# Altium PCB Flight Controller SoM.PcbDoc (part 1 of 3)
Units mm, origin at the board's own origin, x right, y up, seen from the top; angles counter-clockwise.
Board outline 55 x 40 mm, 8 copper layers (L1, L2, L3, L4, L5, L6, L7, L8), stack 1.028 mm thick; 176 components, 217 nets, 863 pads, 595 vias.
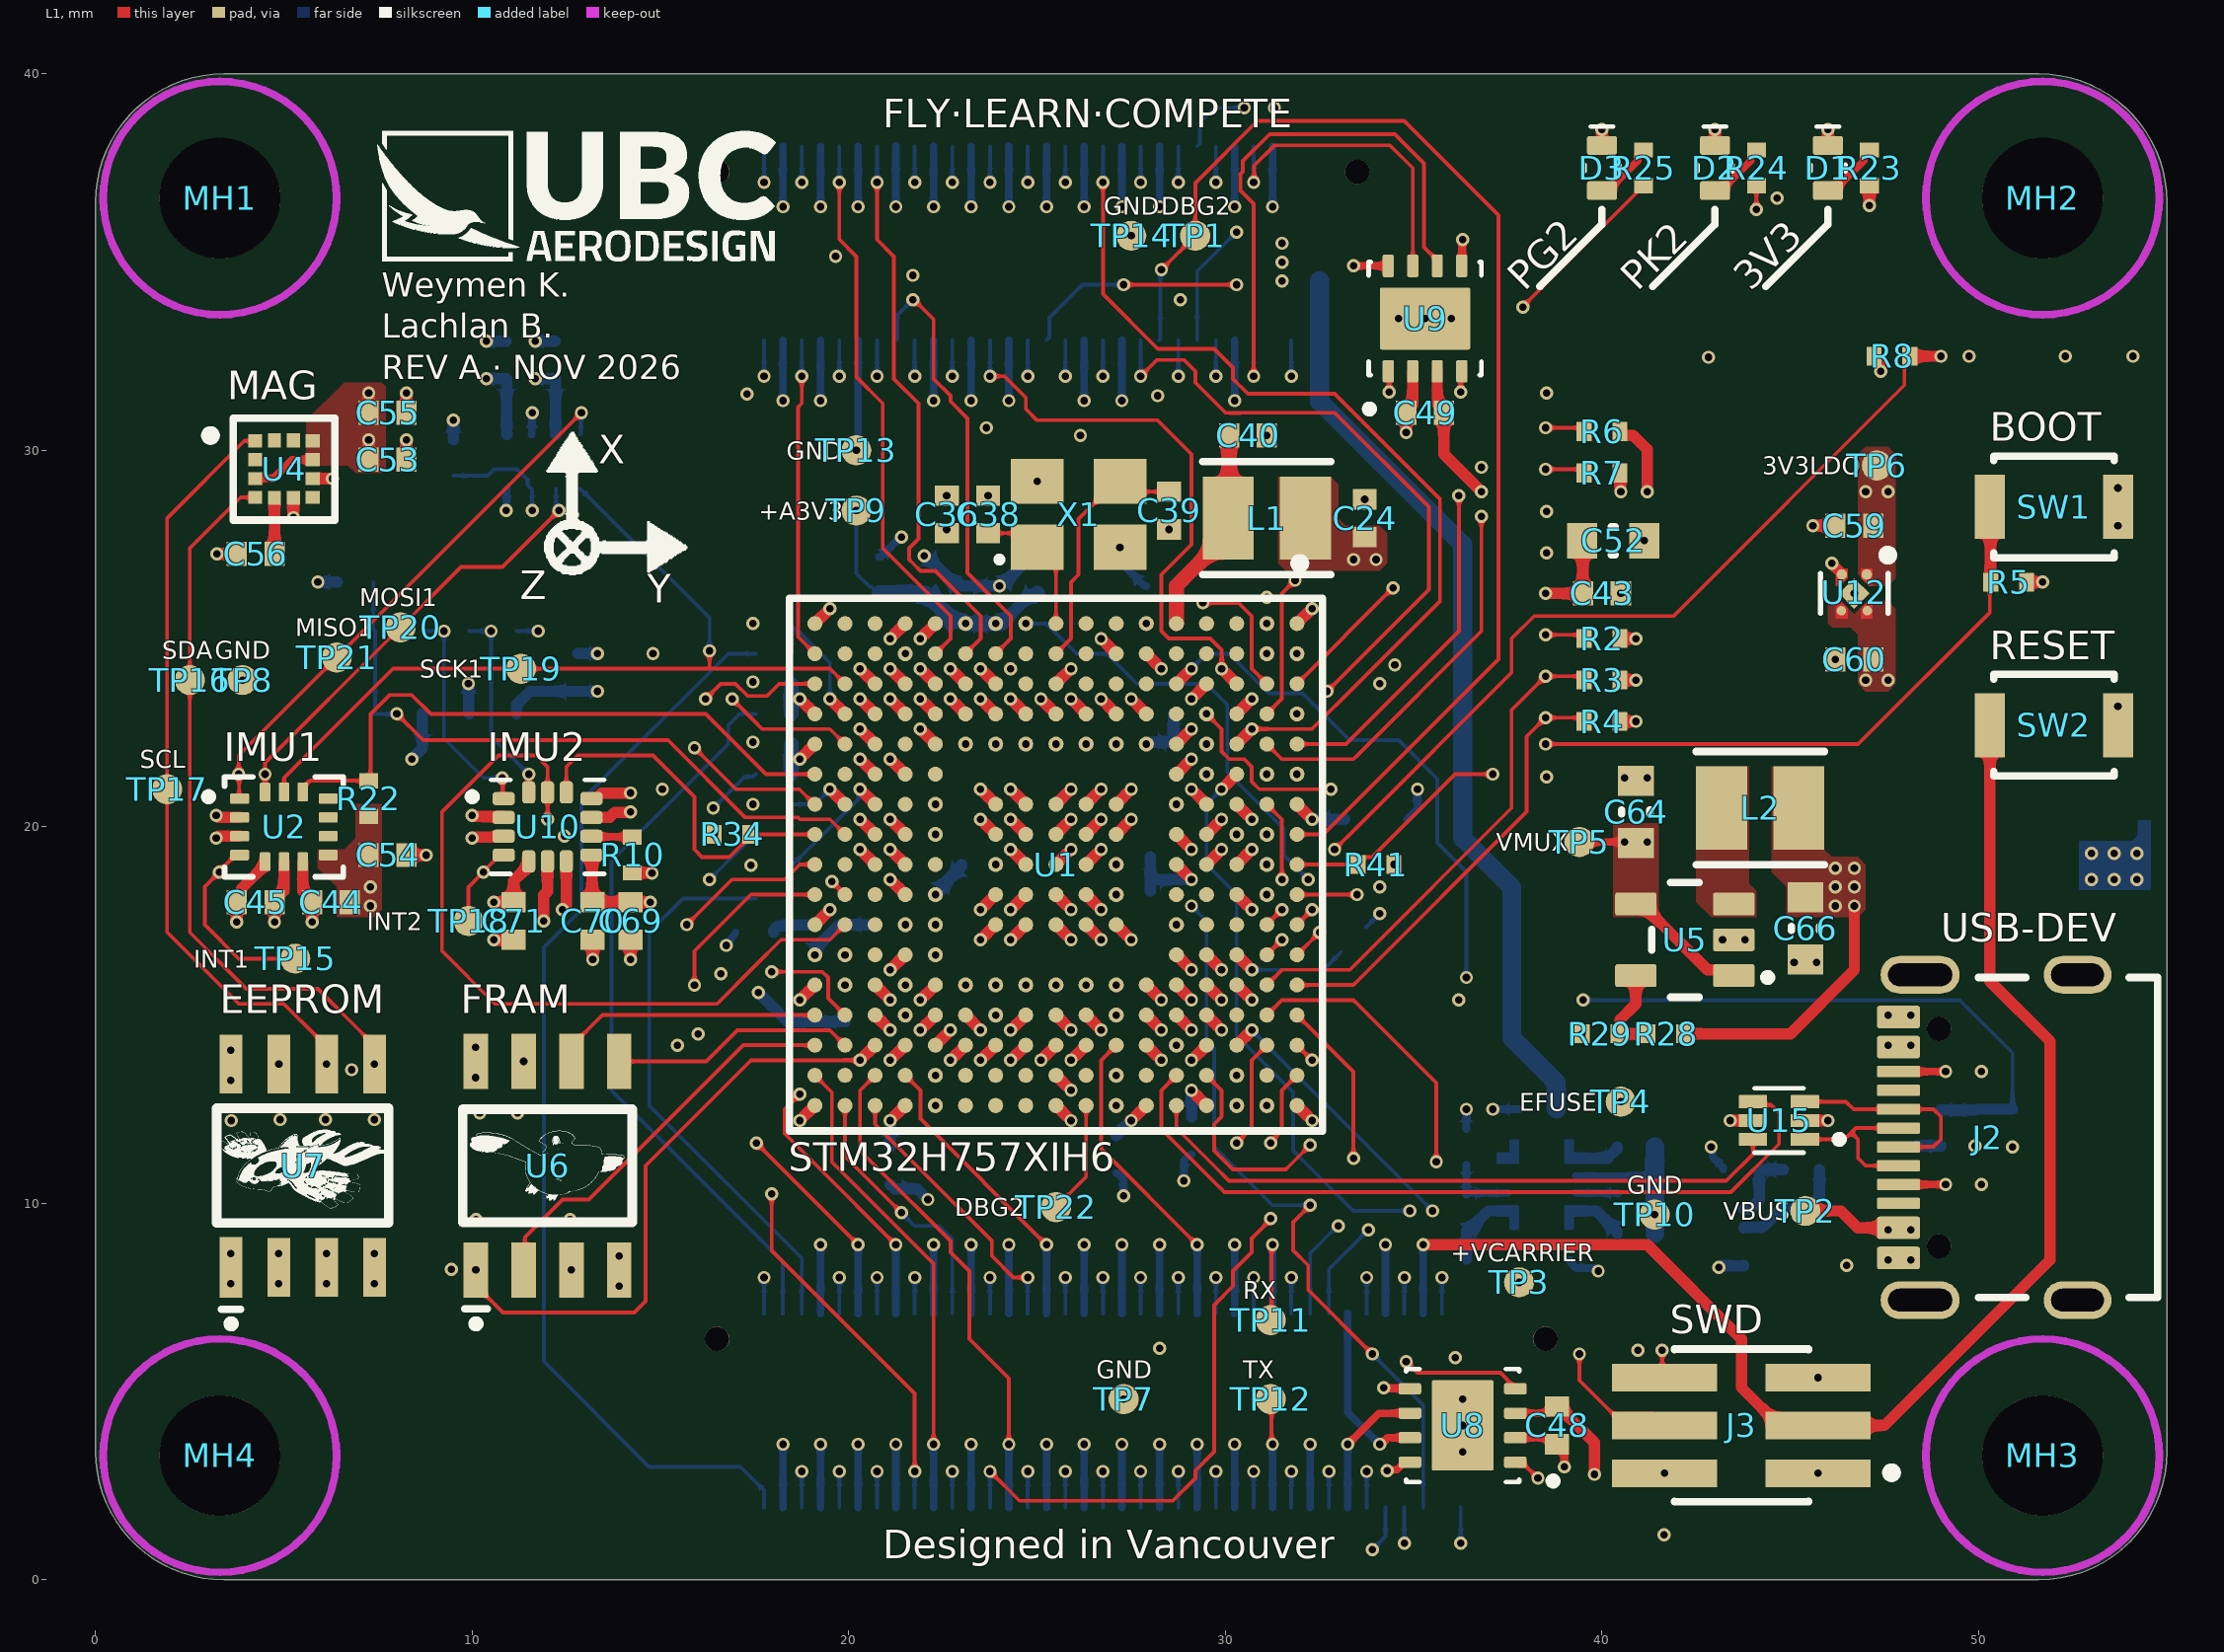
[diagram p0: L1 view]
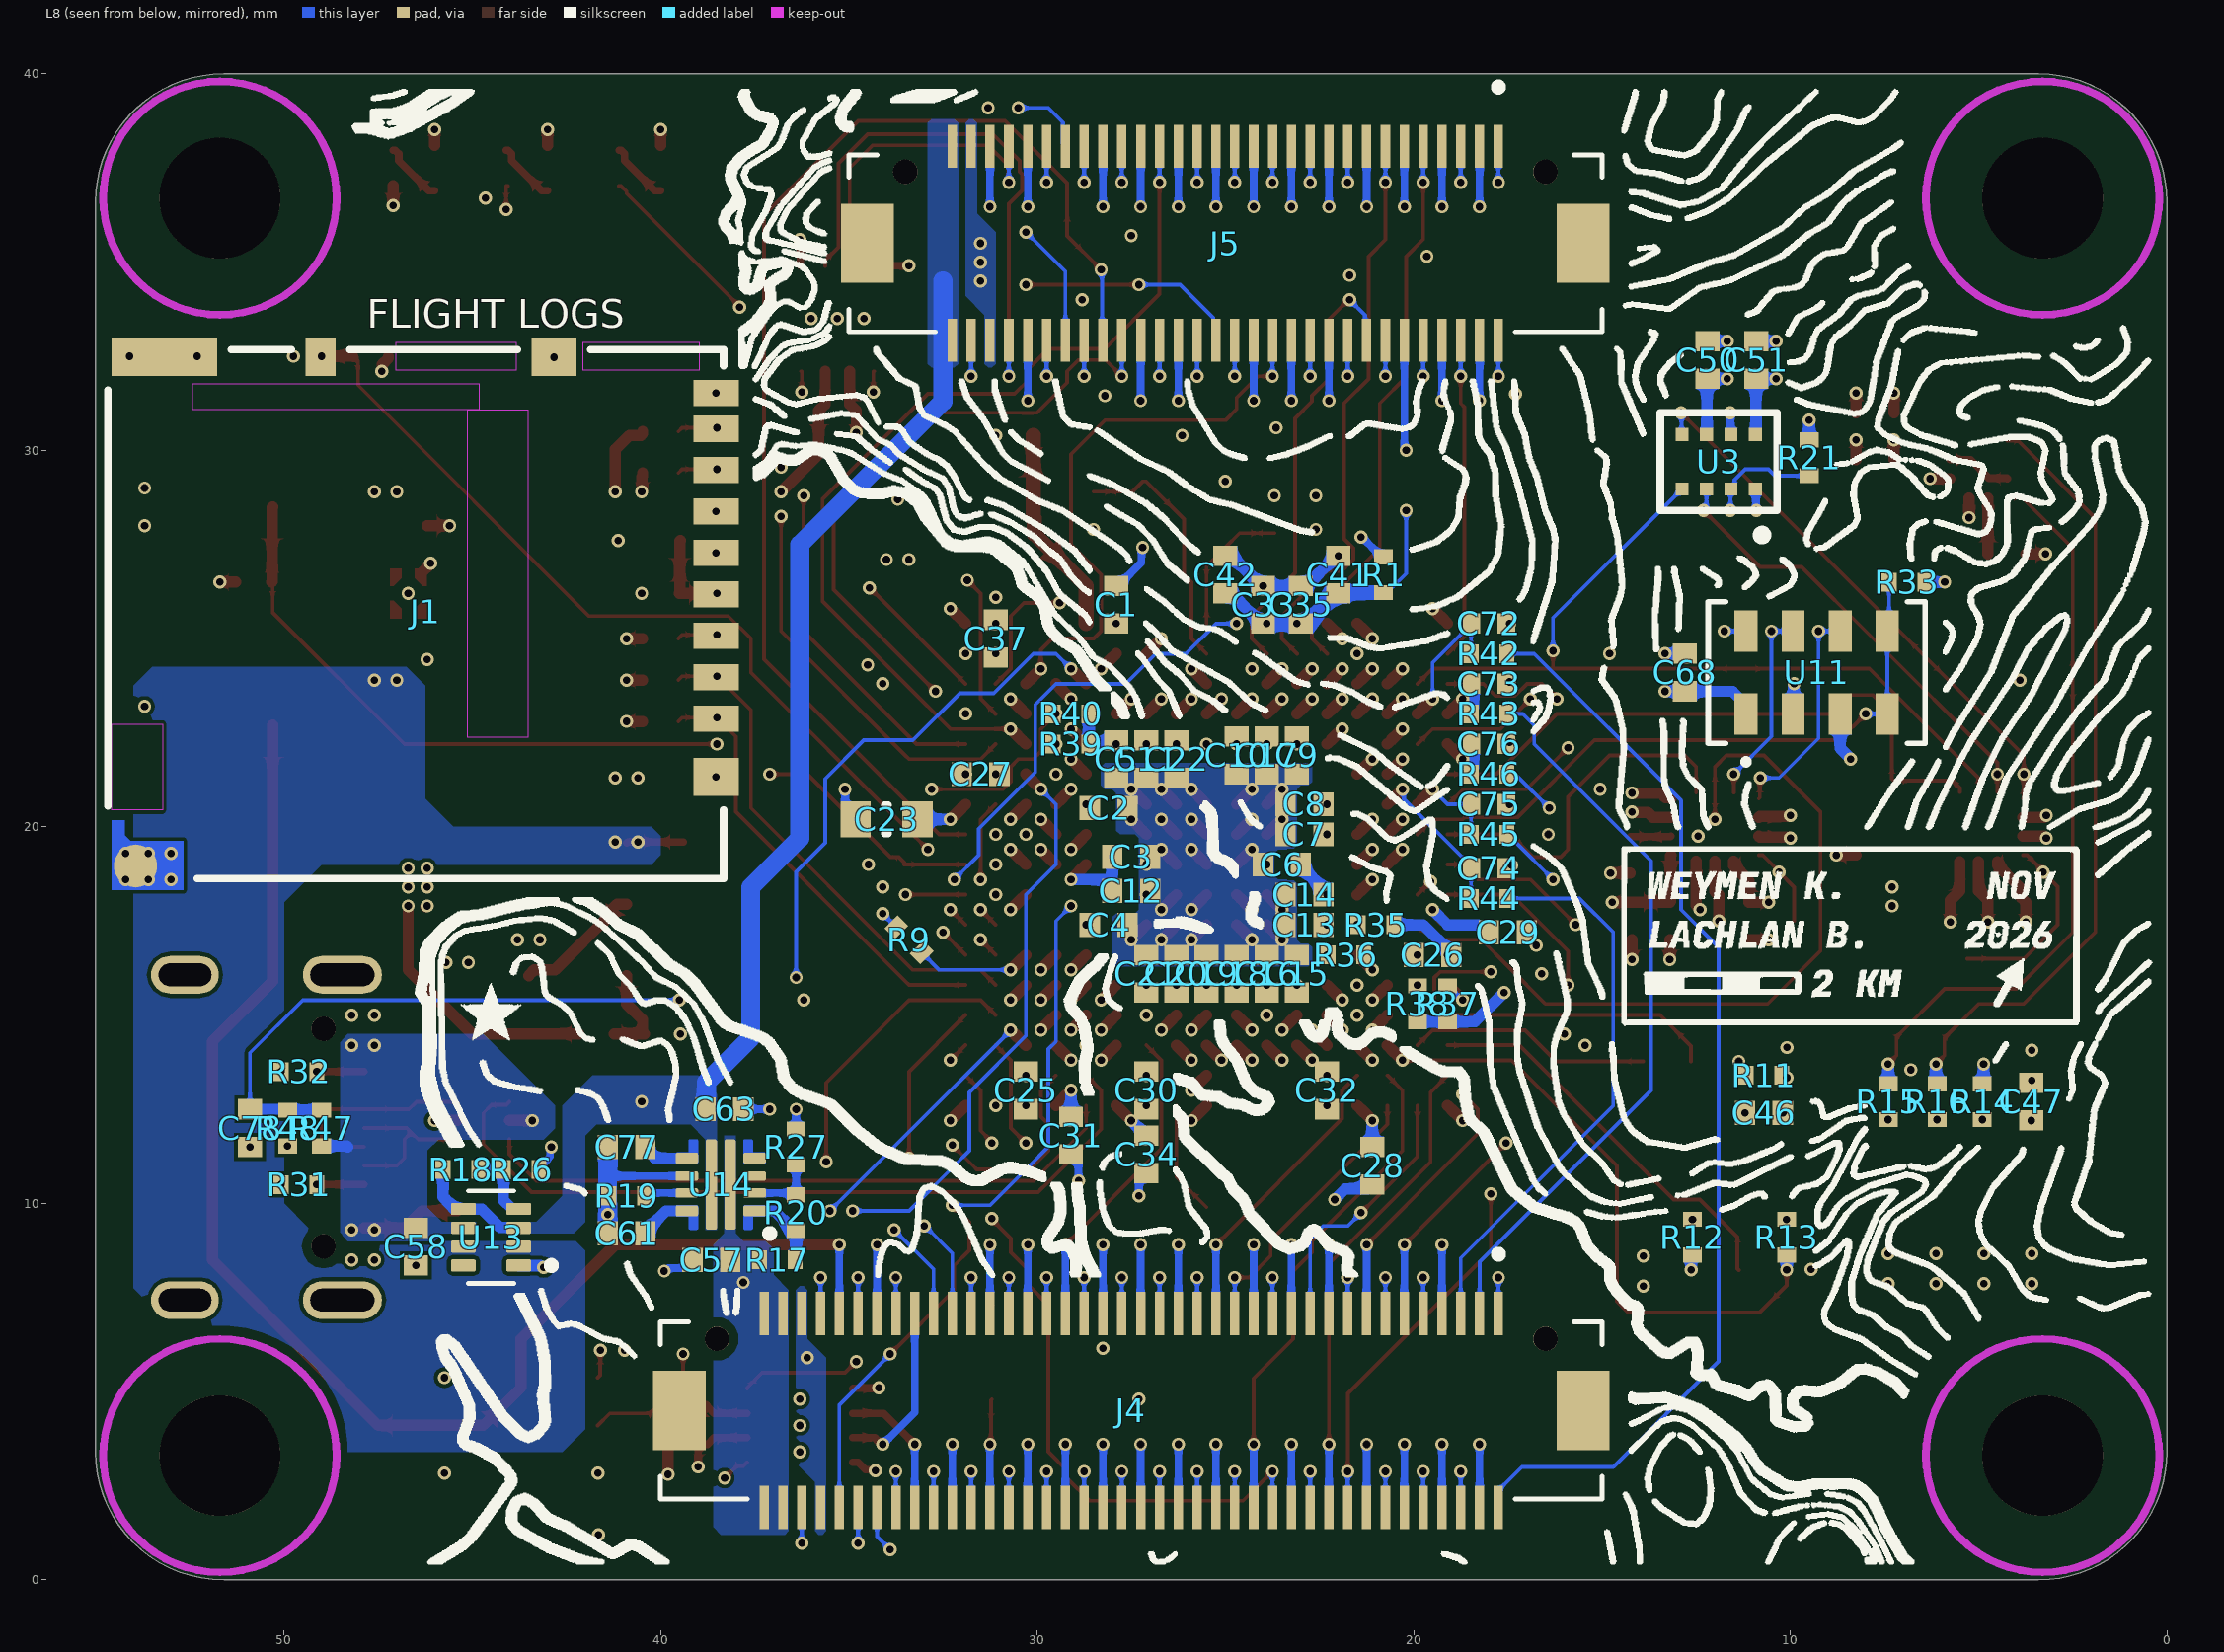
[diagram p1: L8 view, seen from below]
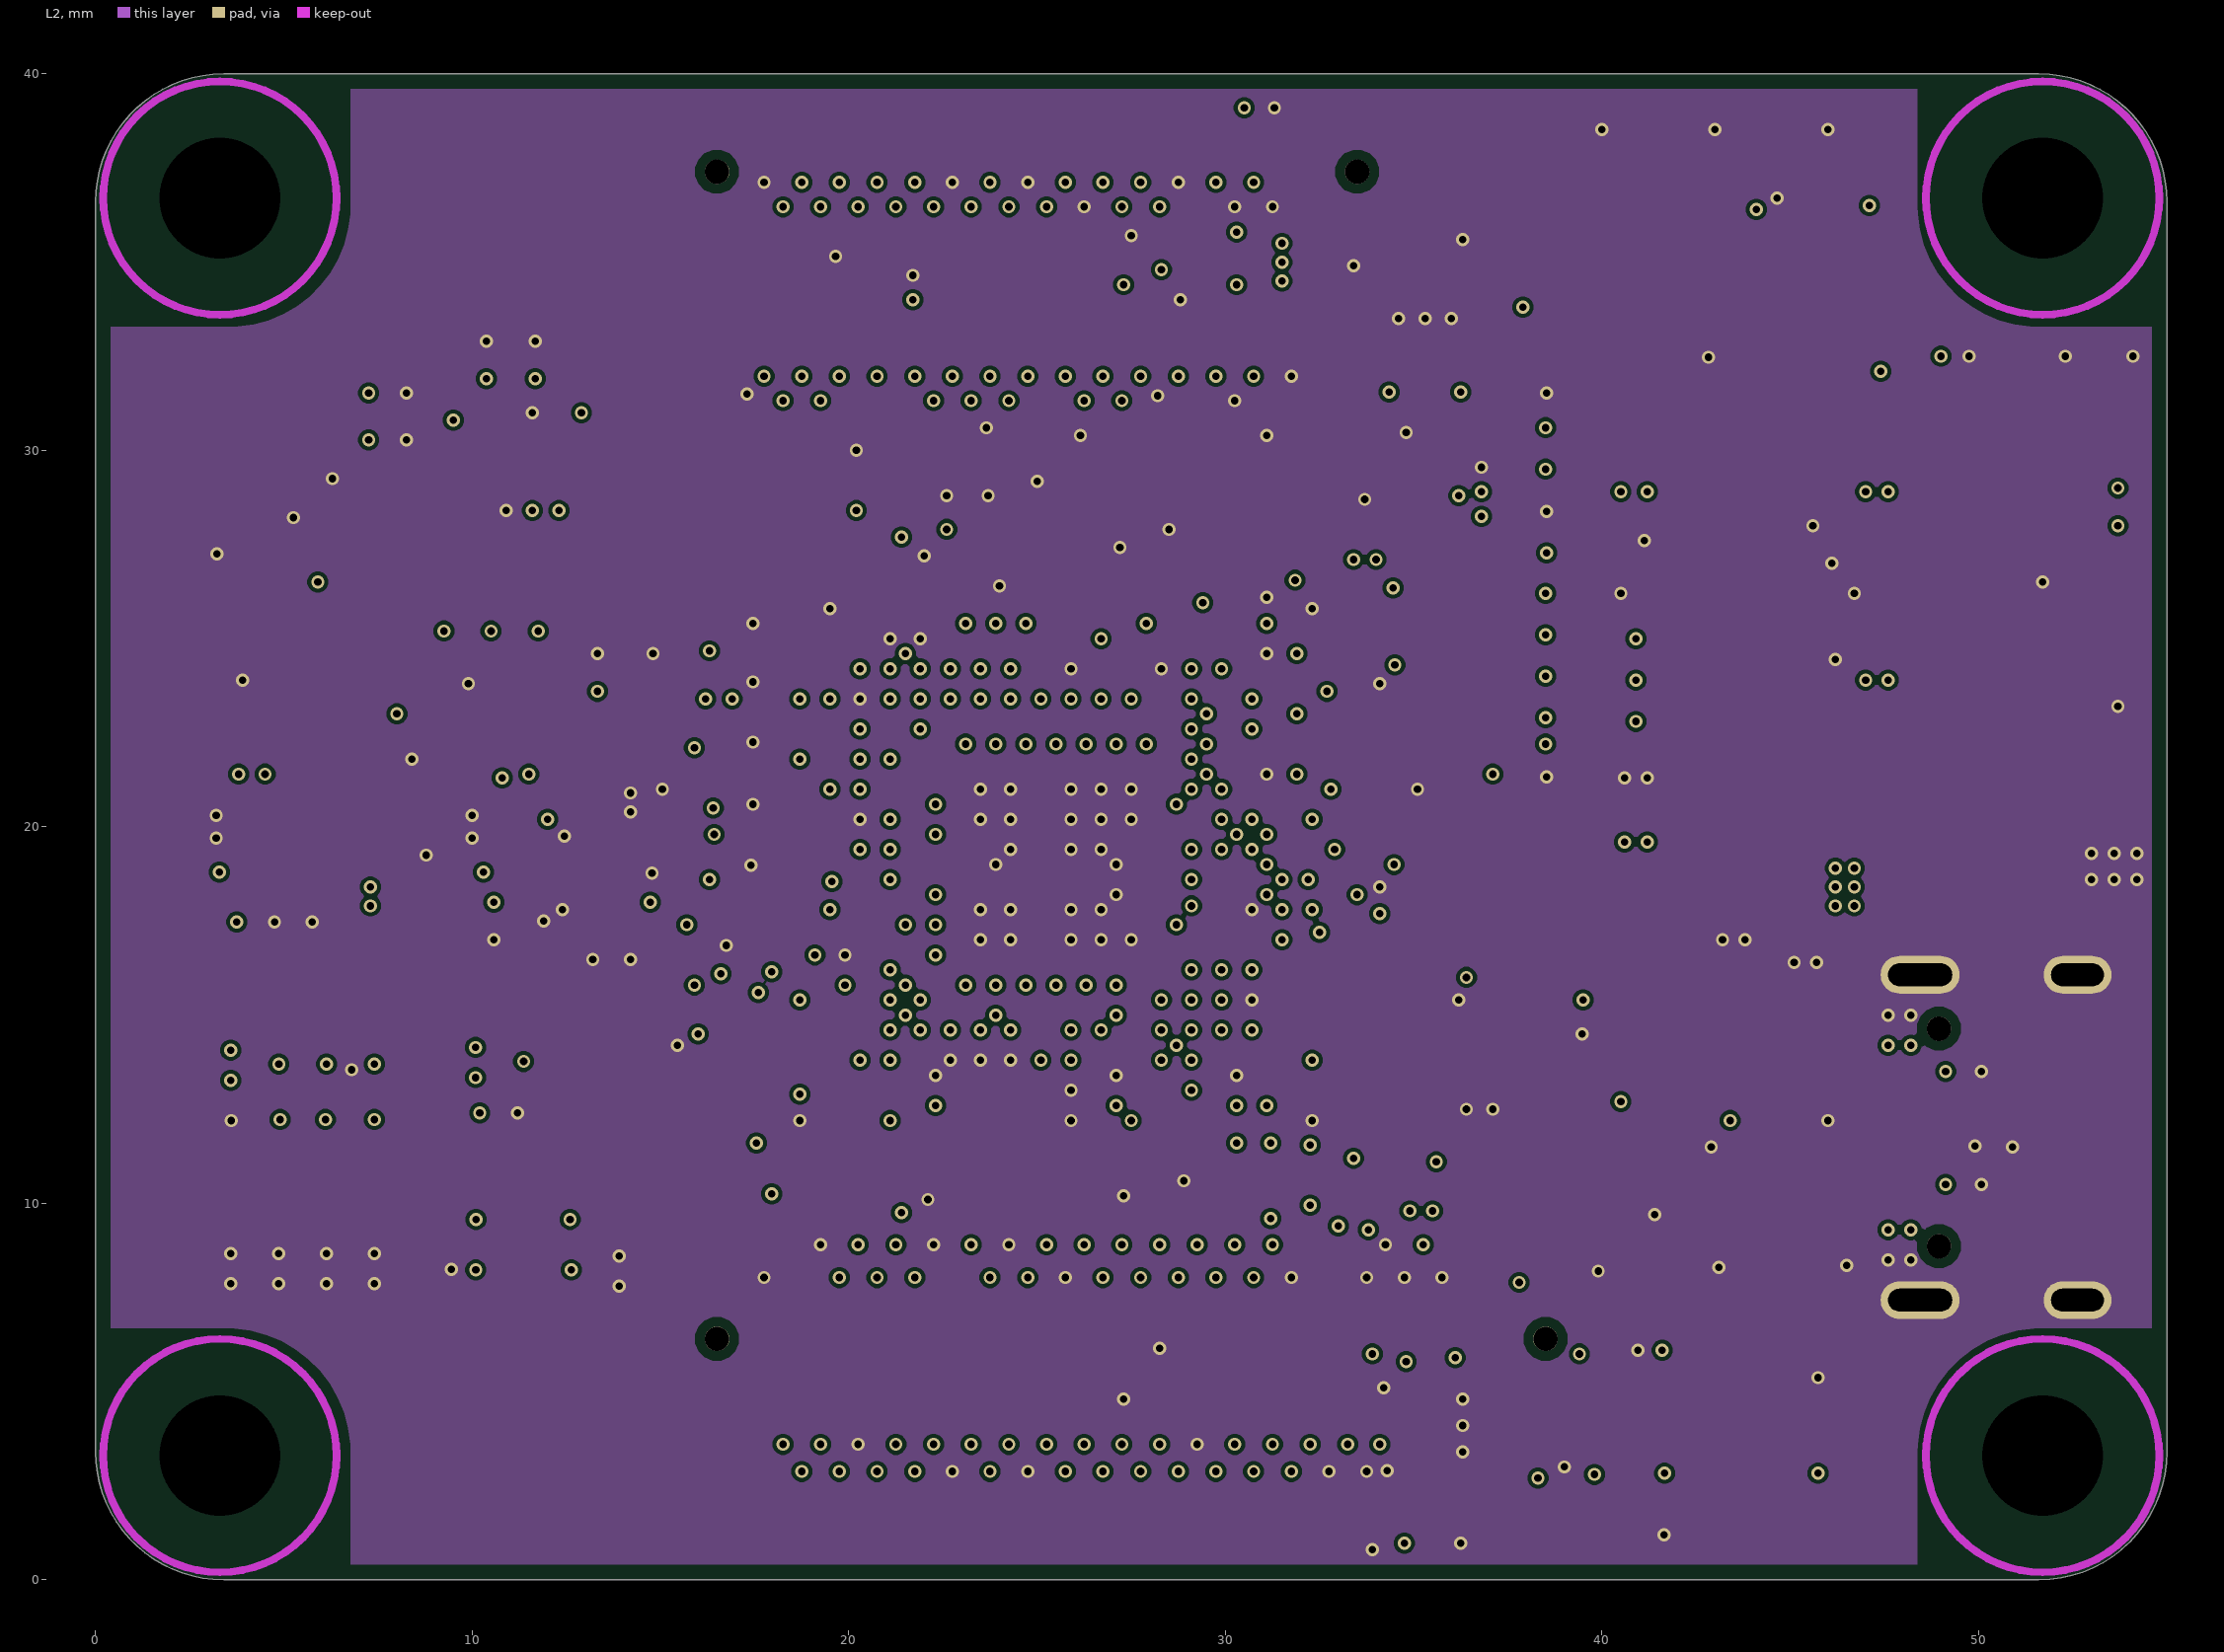
[diagram p2: L2]
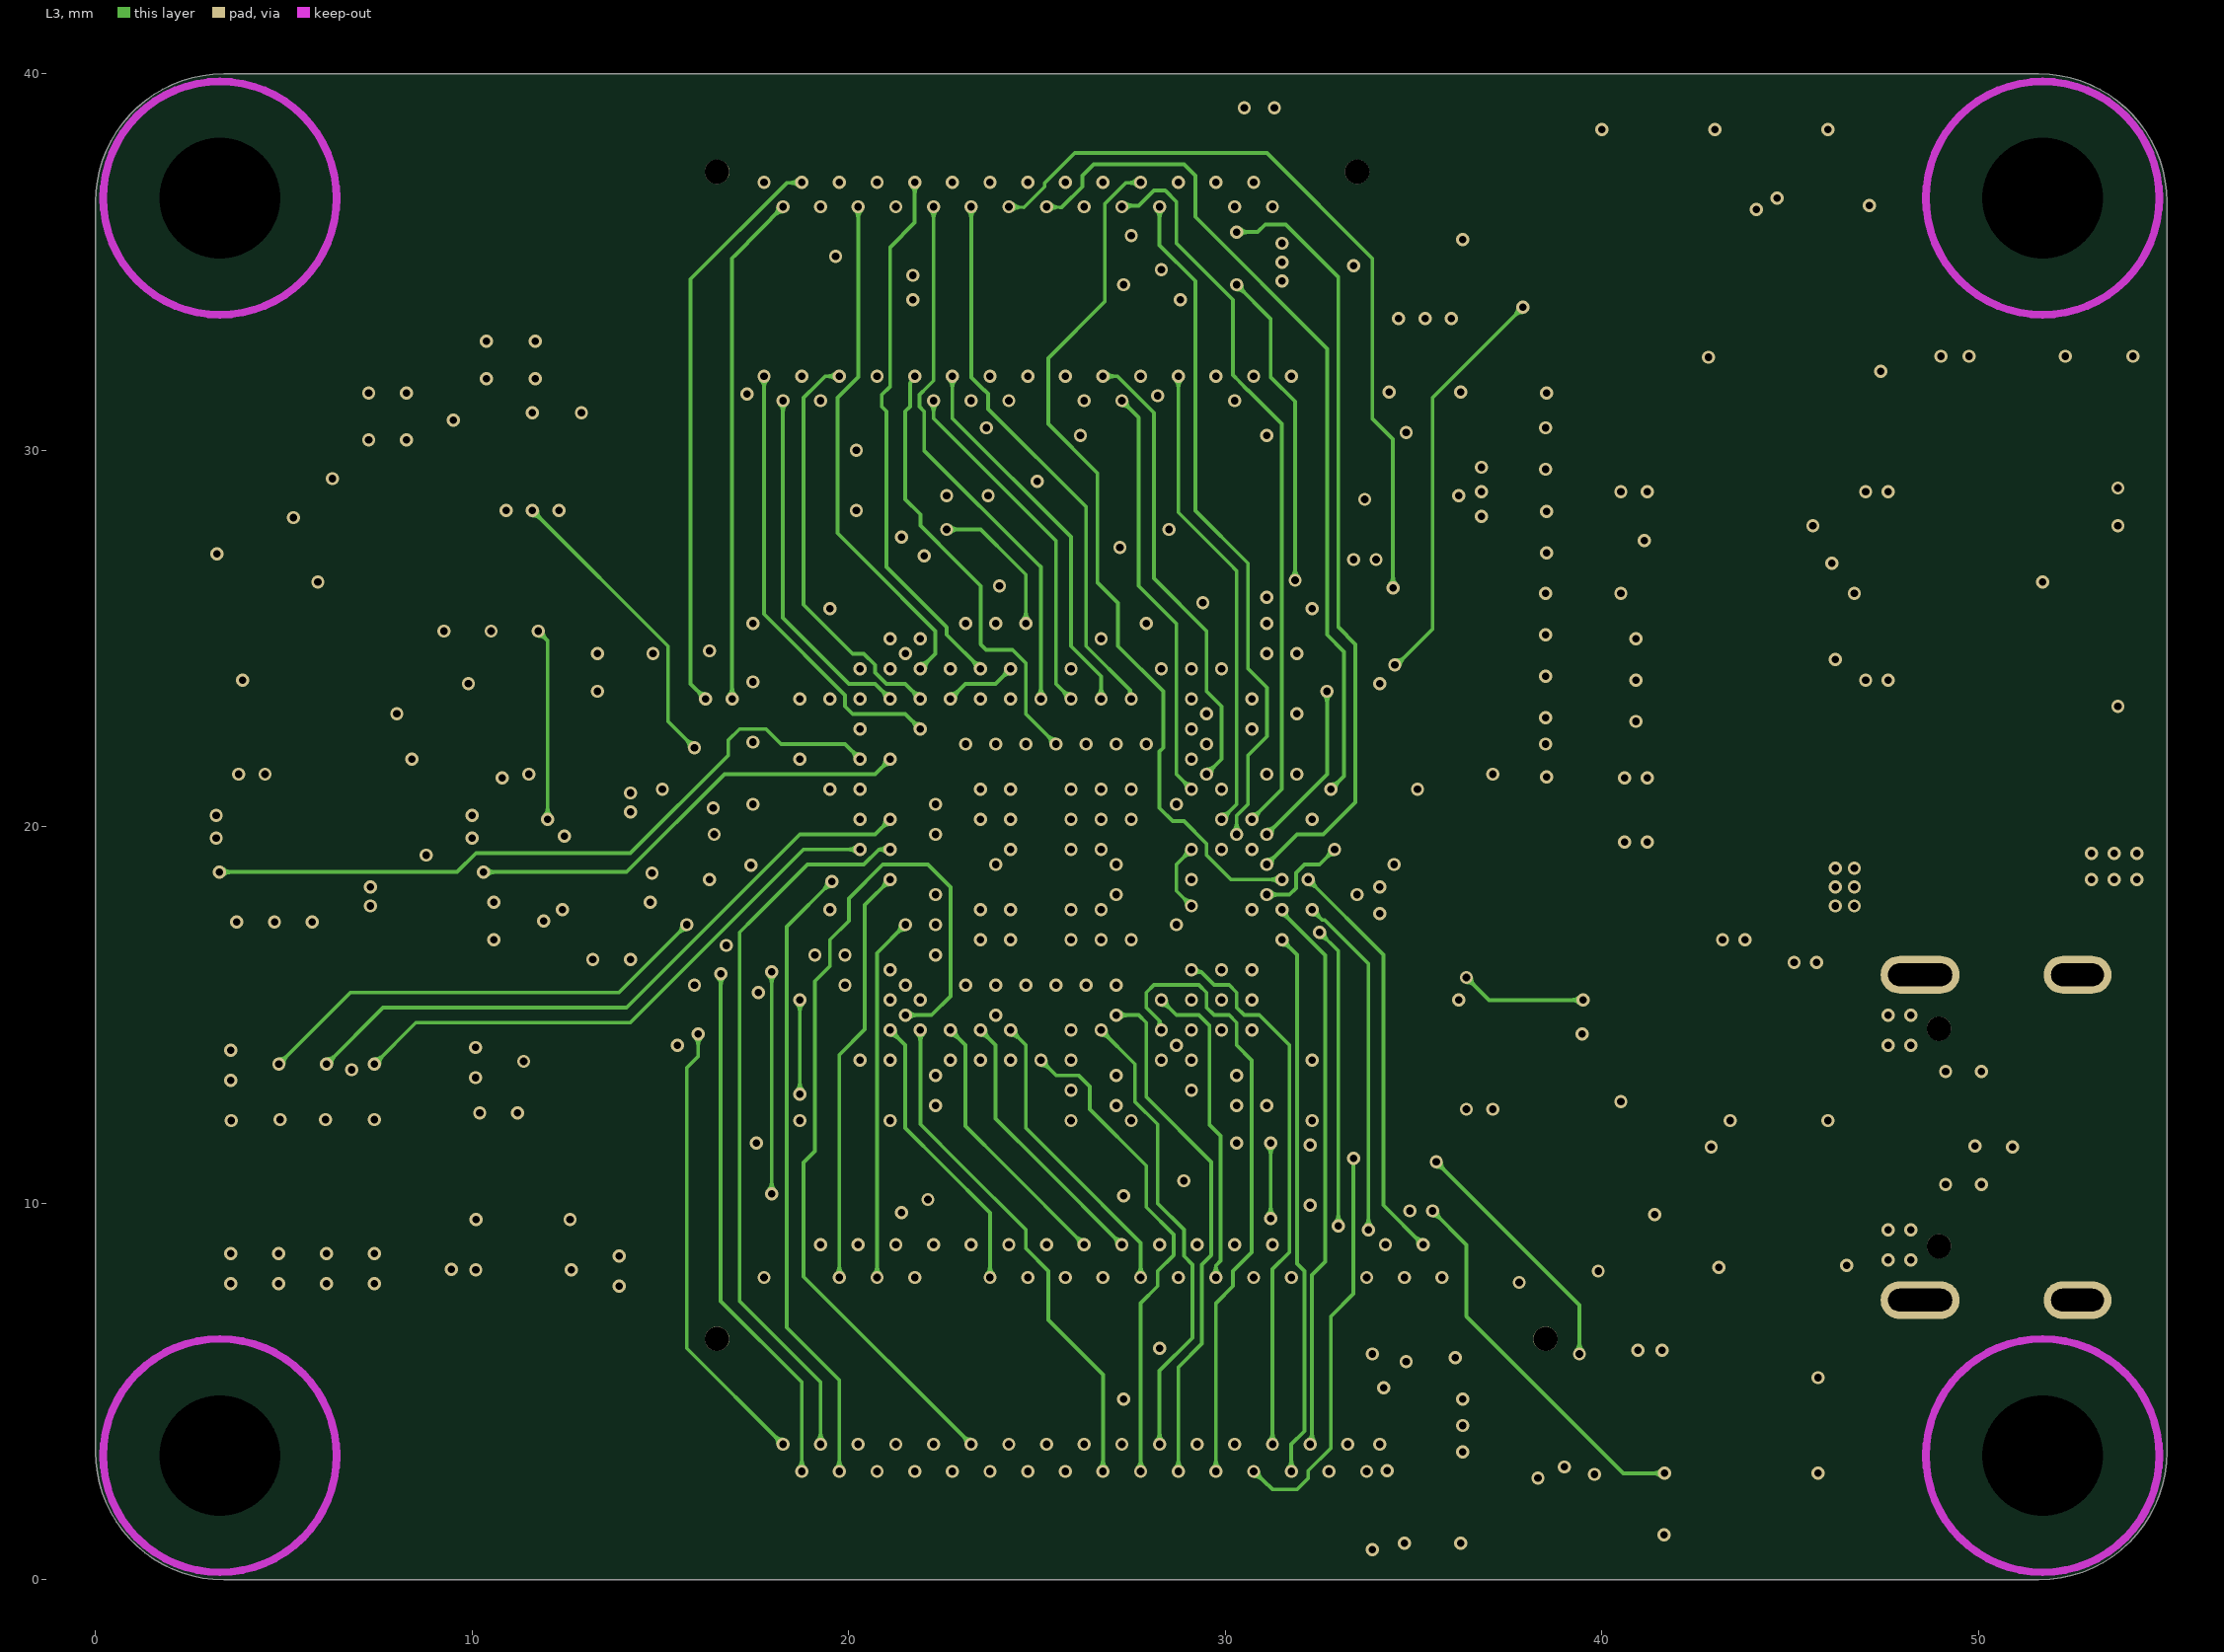
[diagram p3: L3]
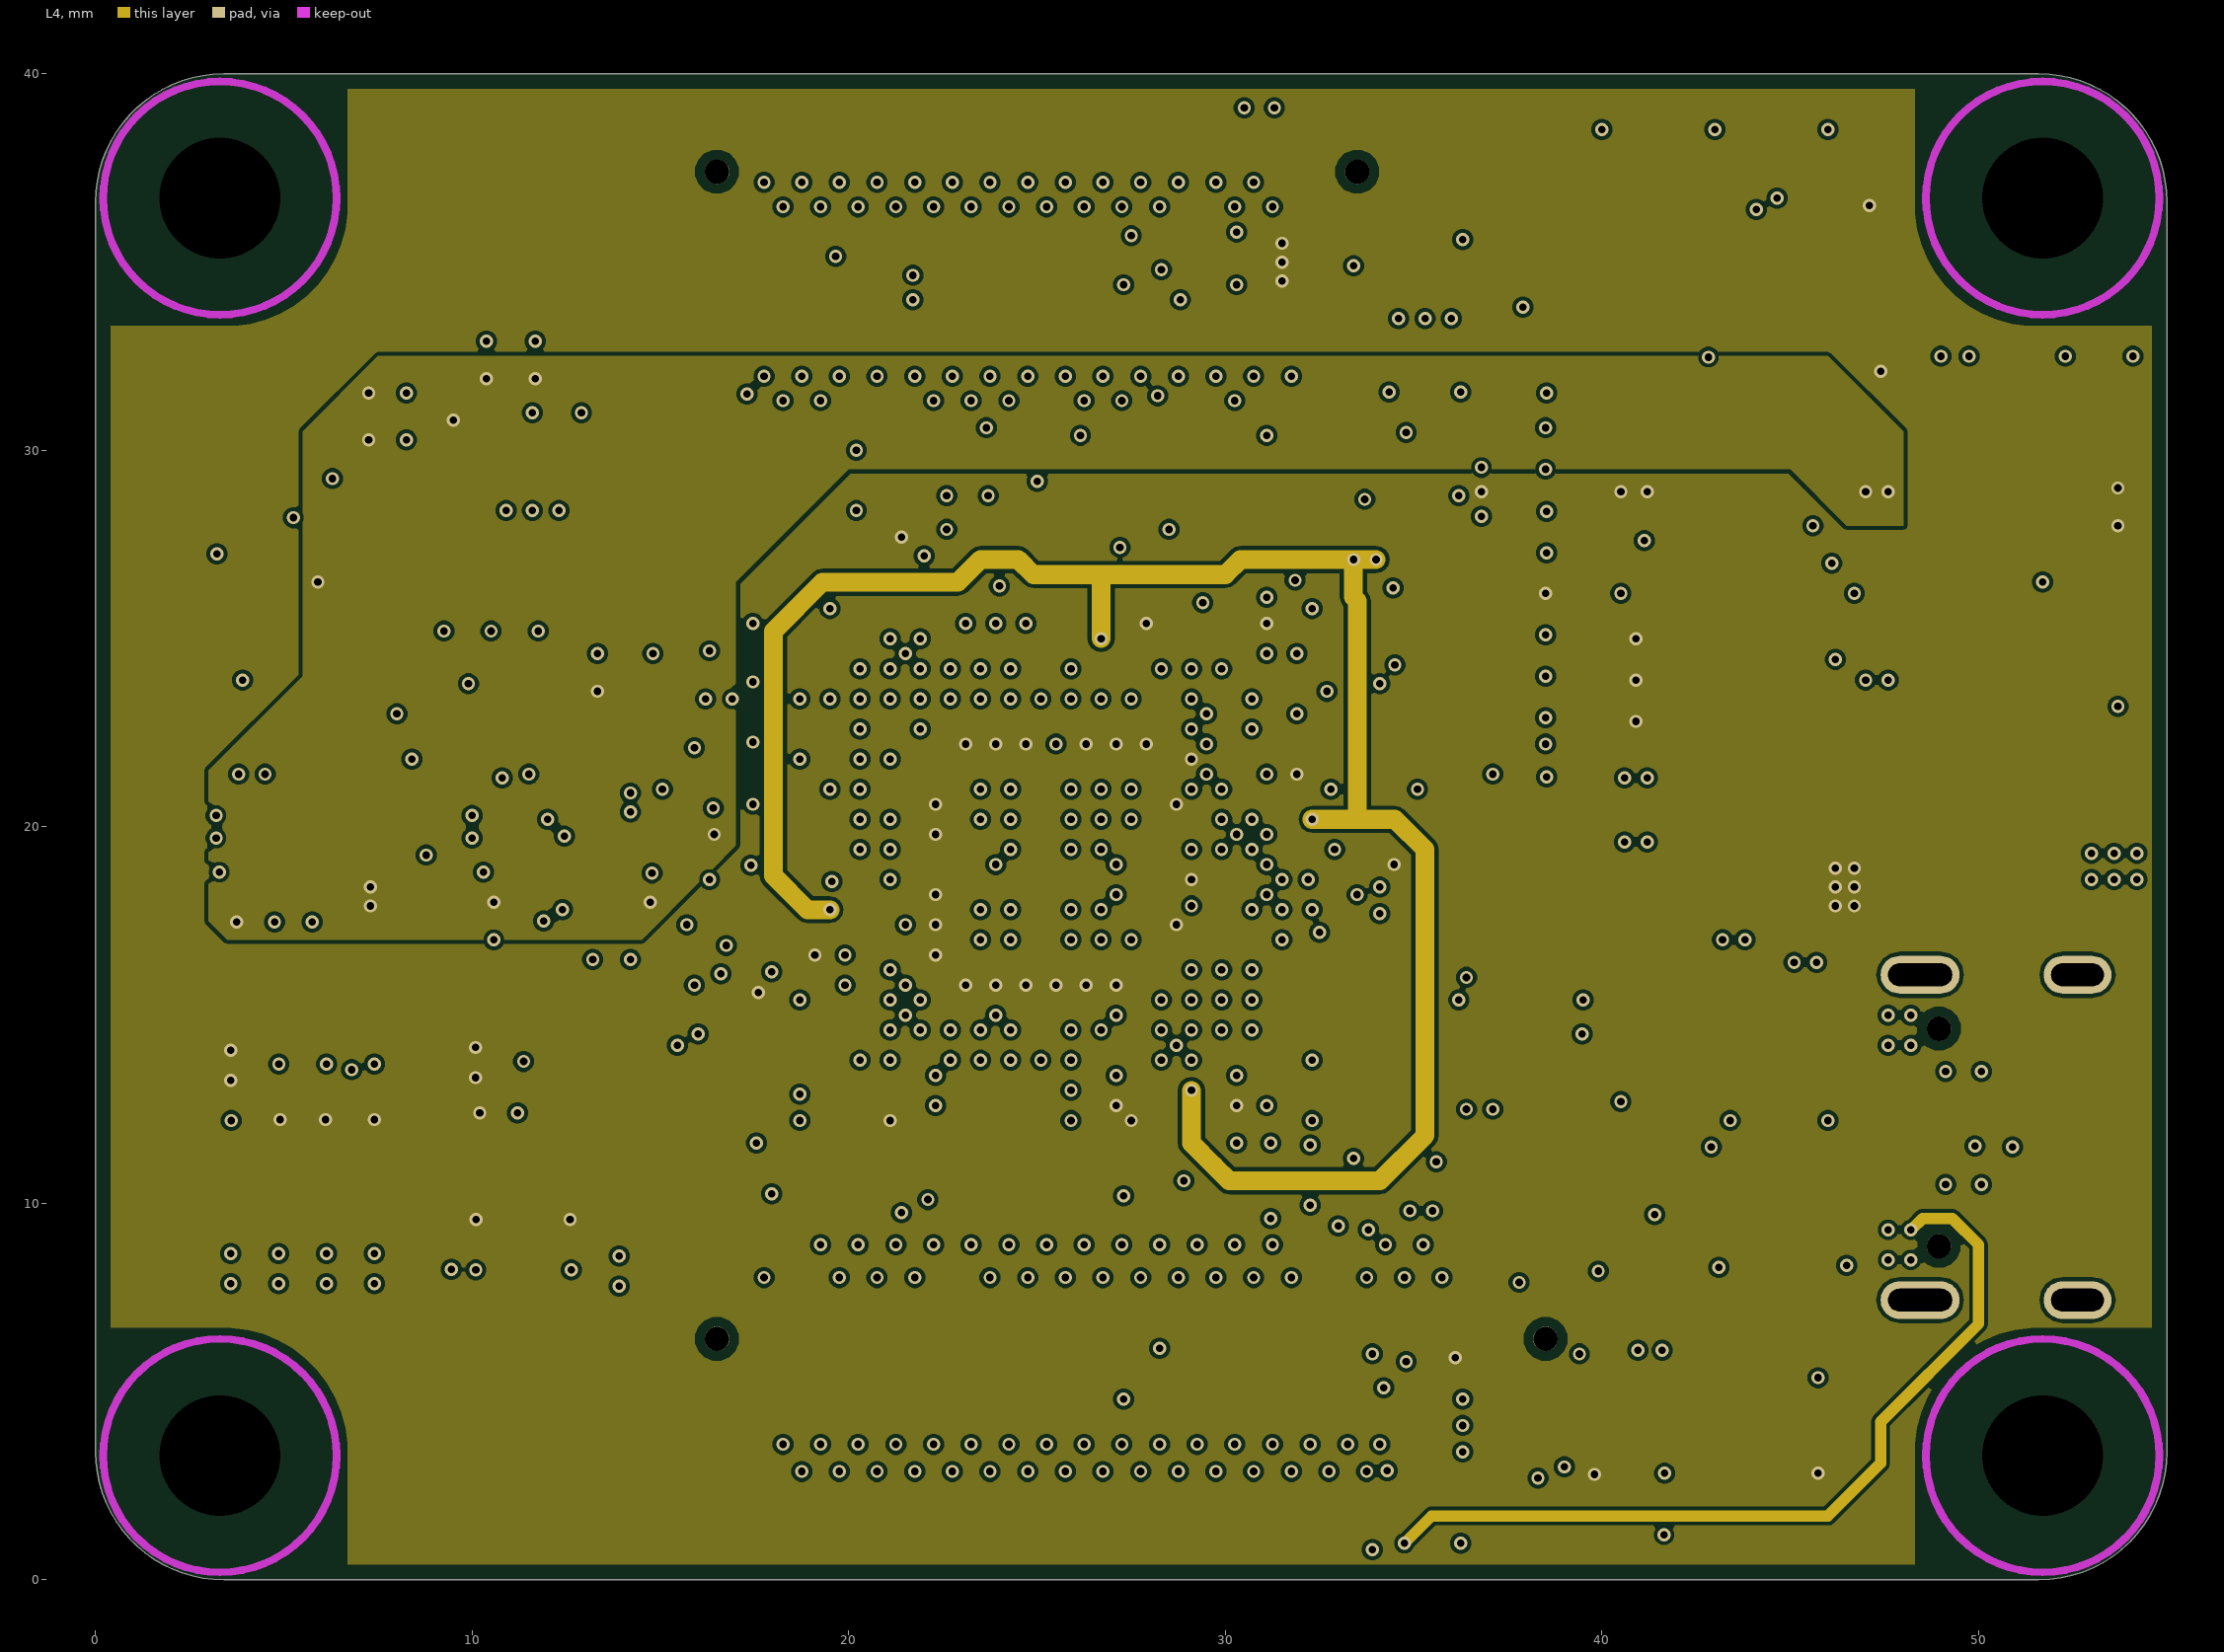
[diagram p4: L4]
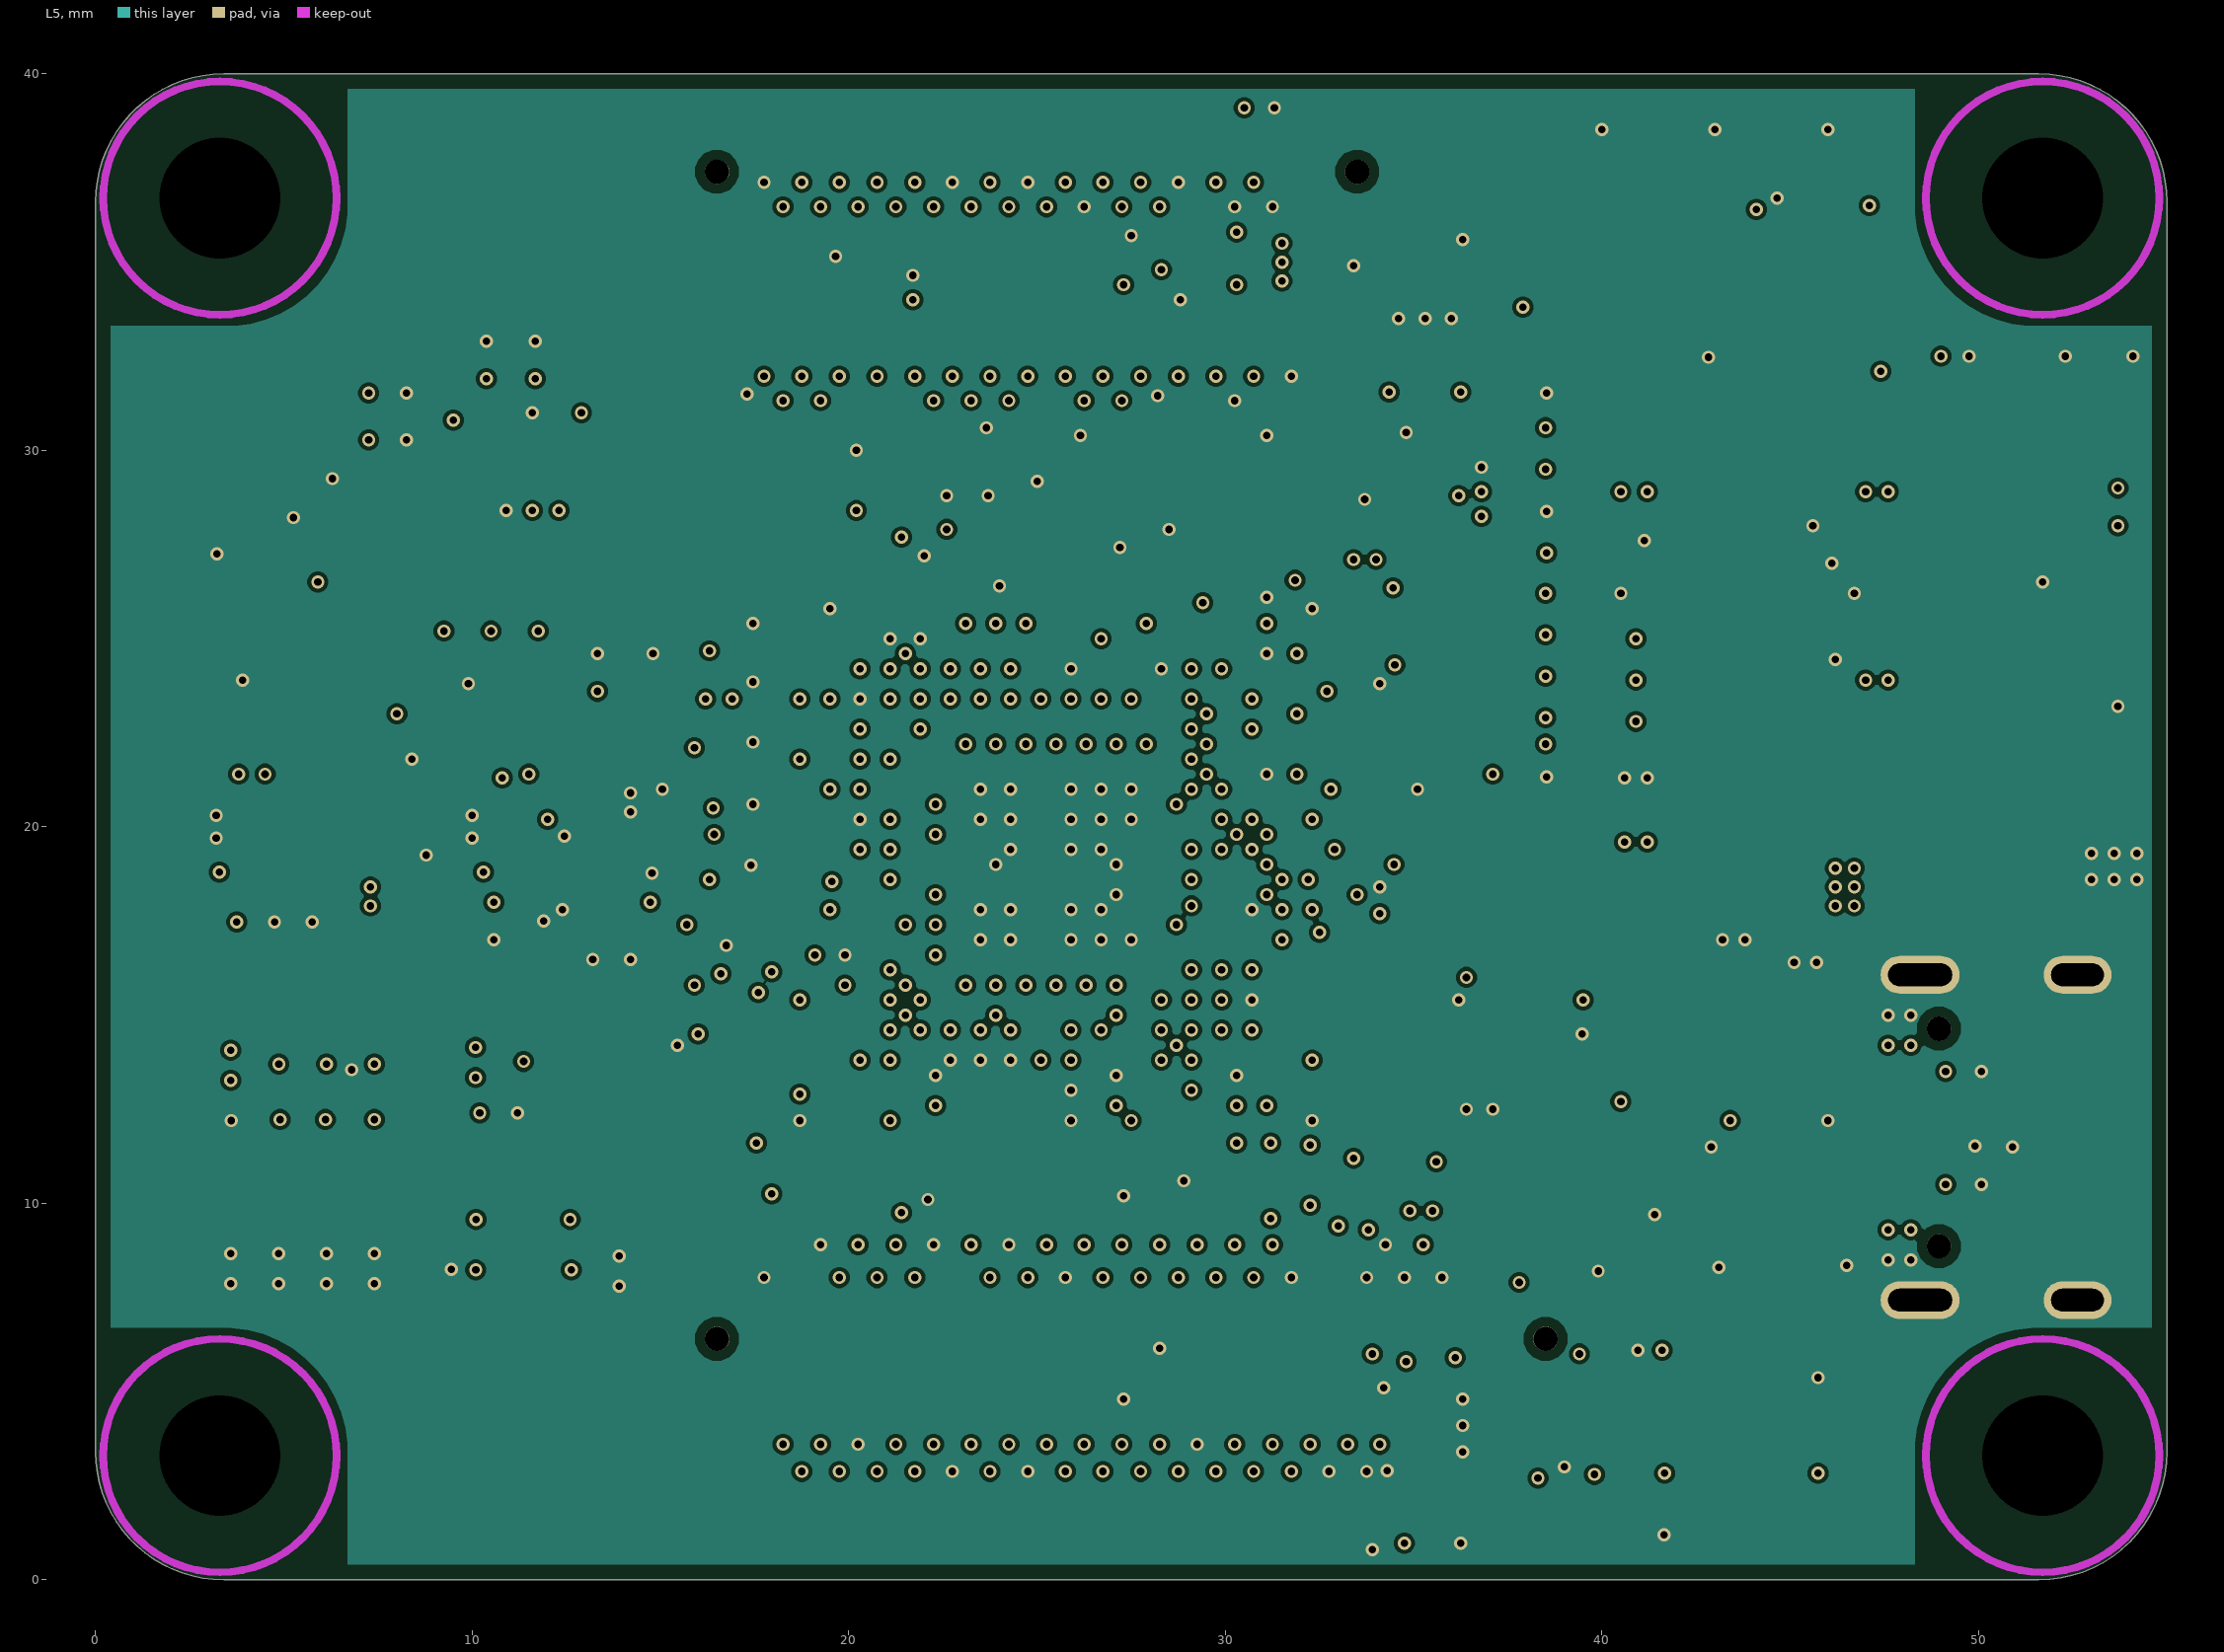
[diagram p5: L5]
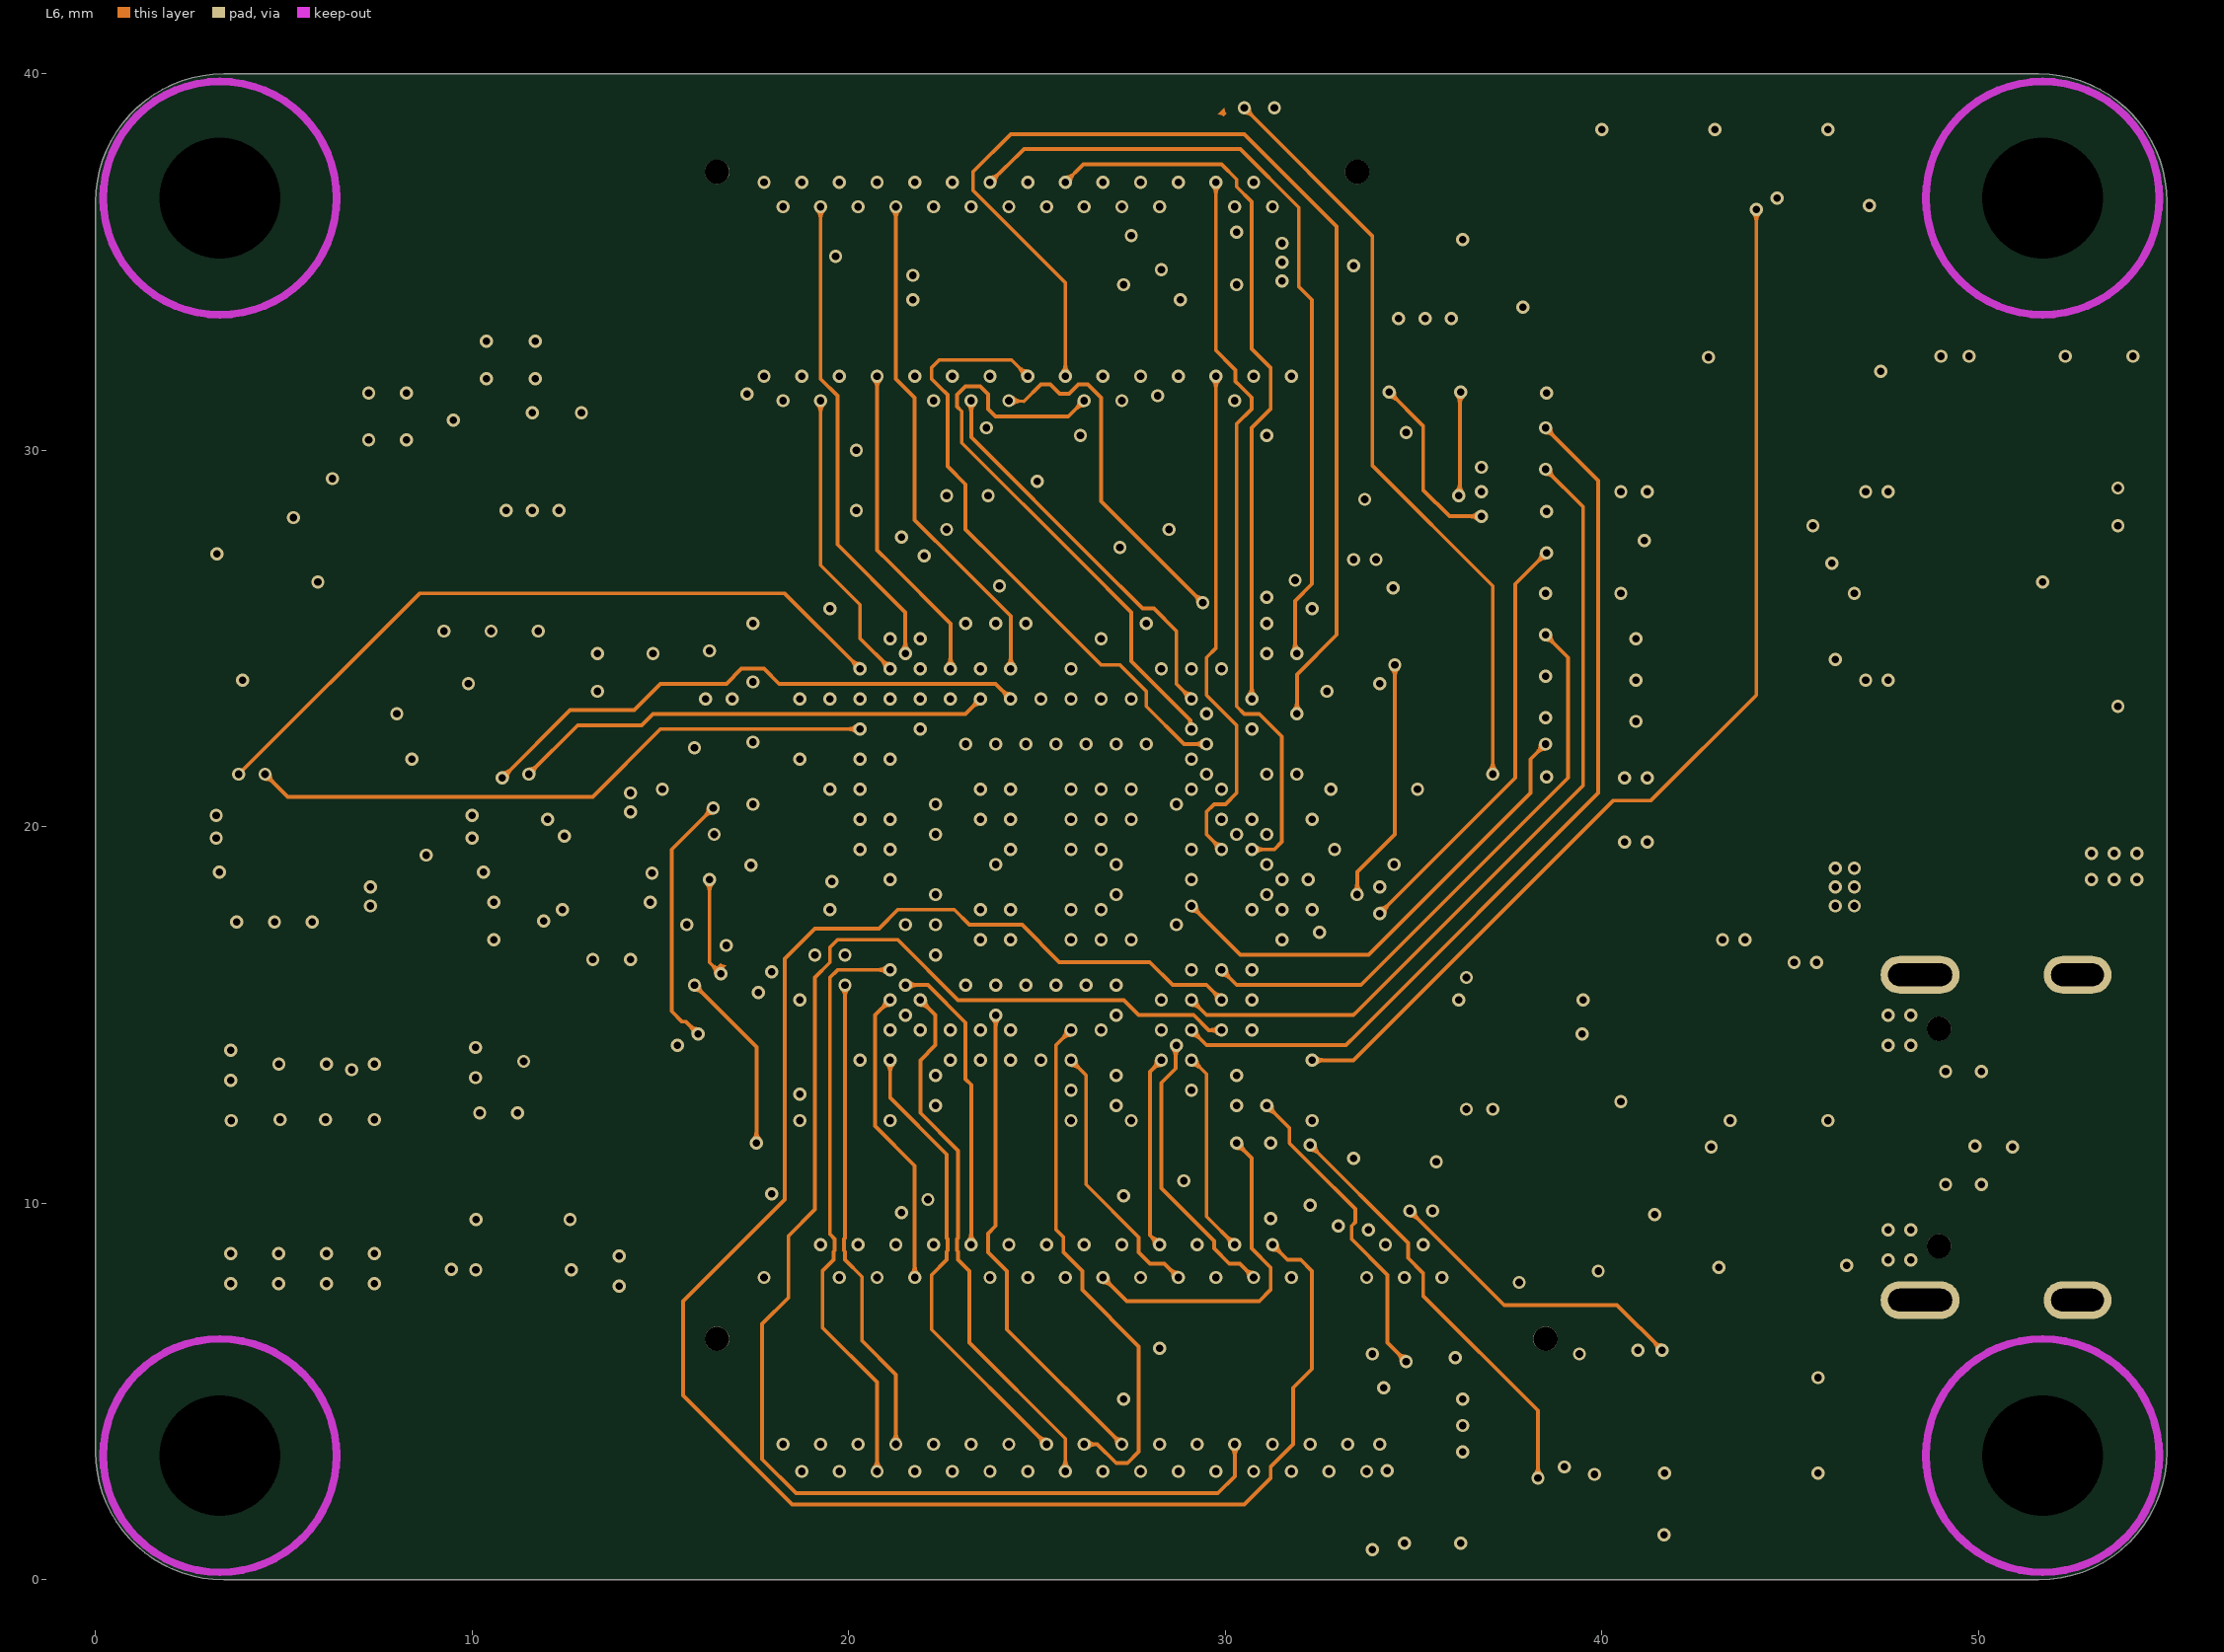
[diagram p6: L6]
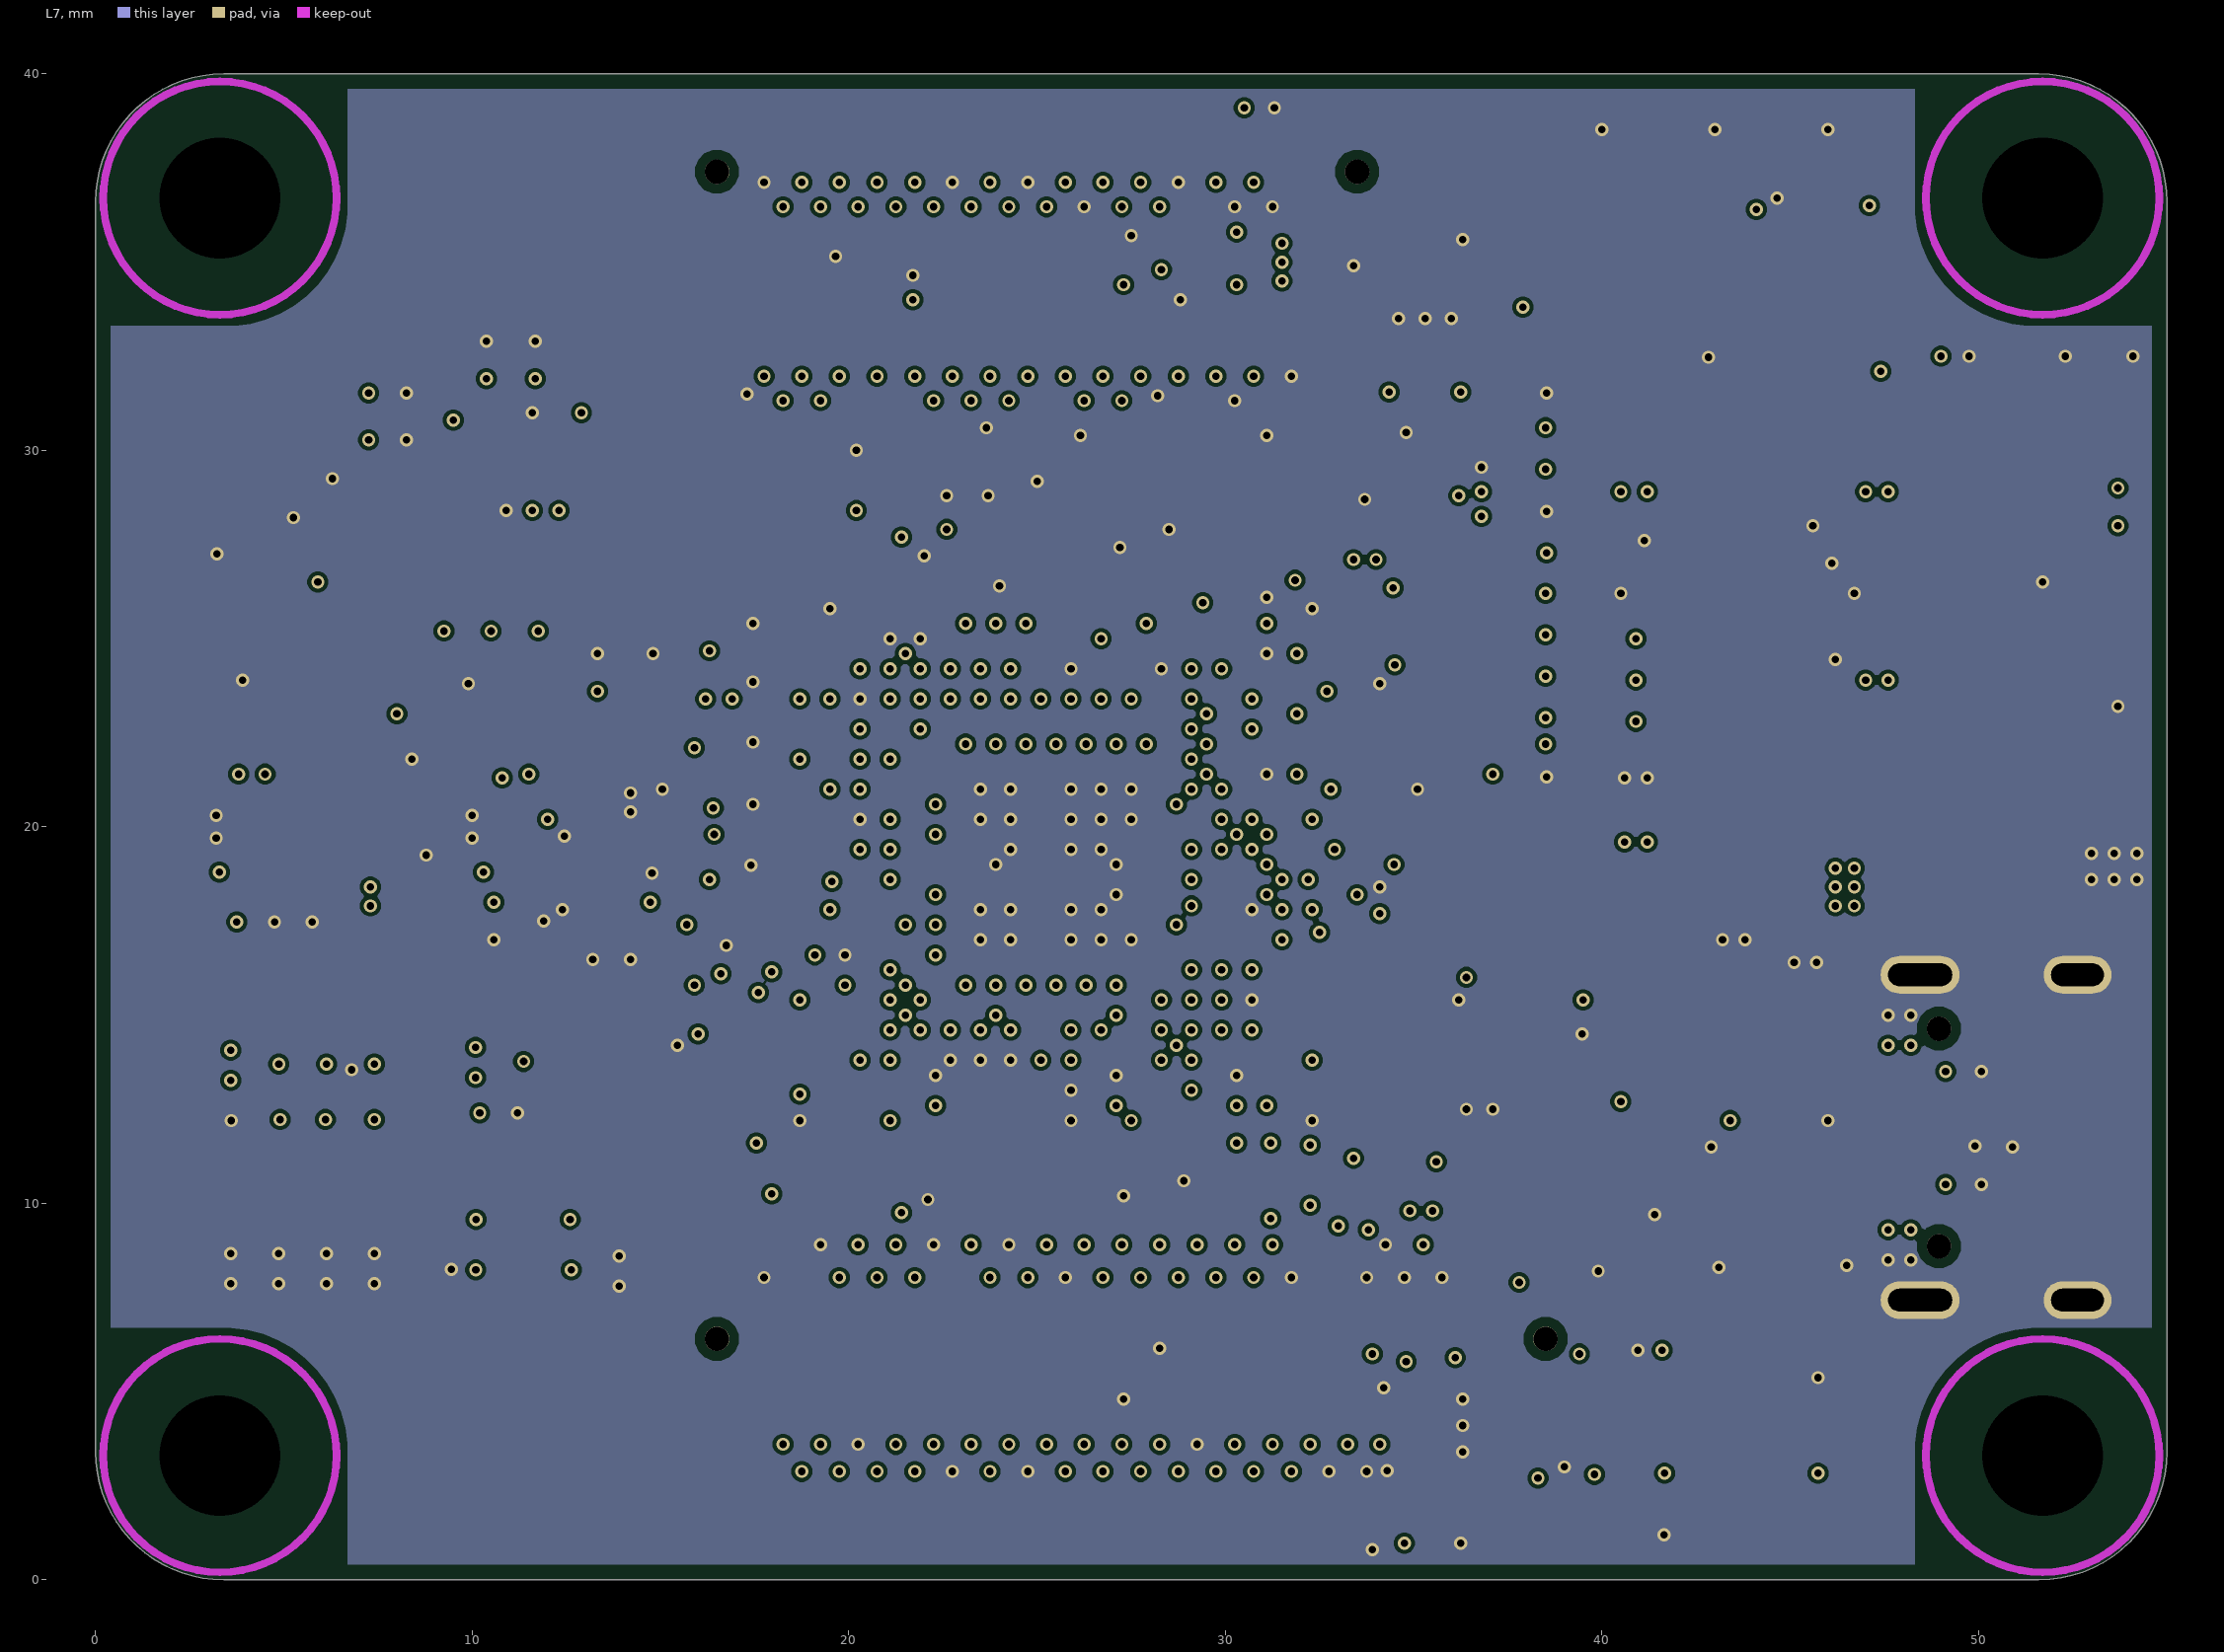
[diagram p7: L7]
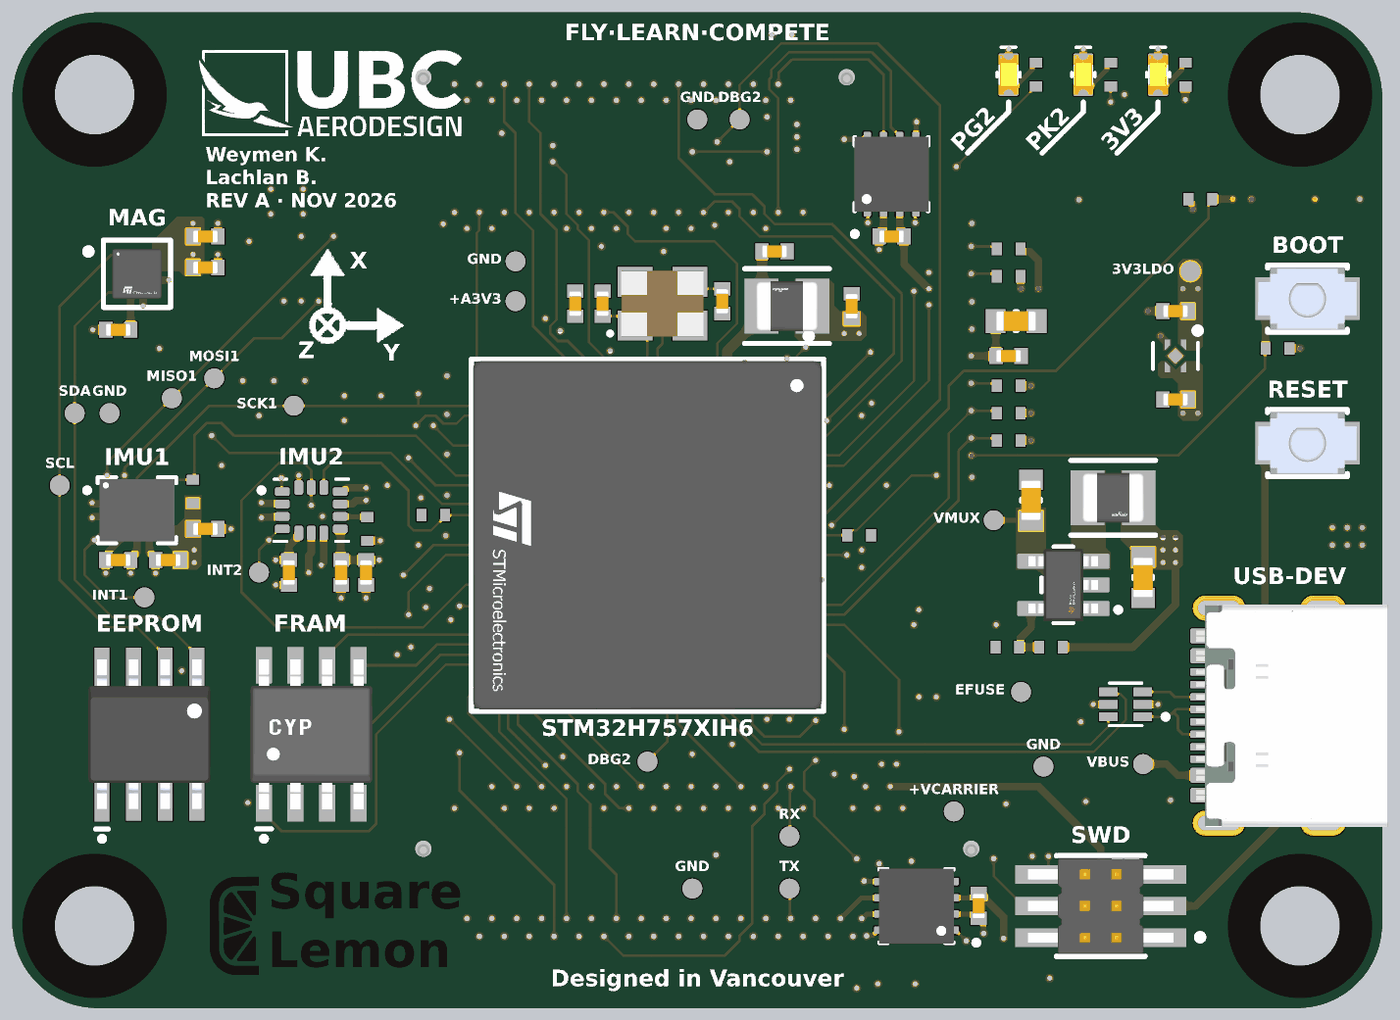
[diagram p10: 3D render of the assembled board from above, using the file's embedded part models]
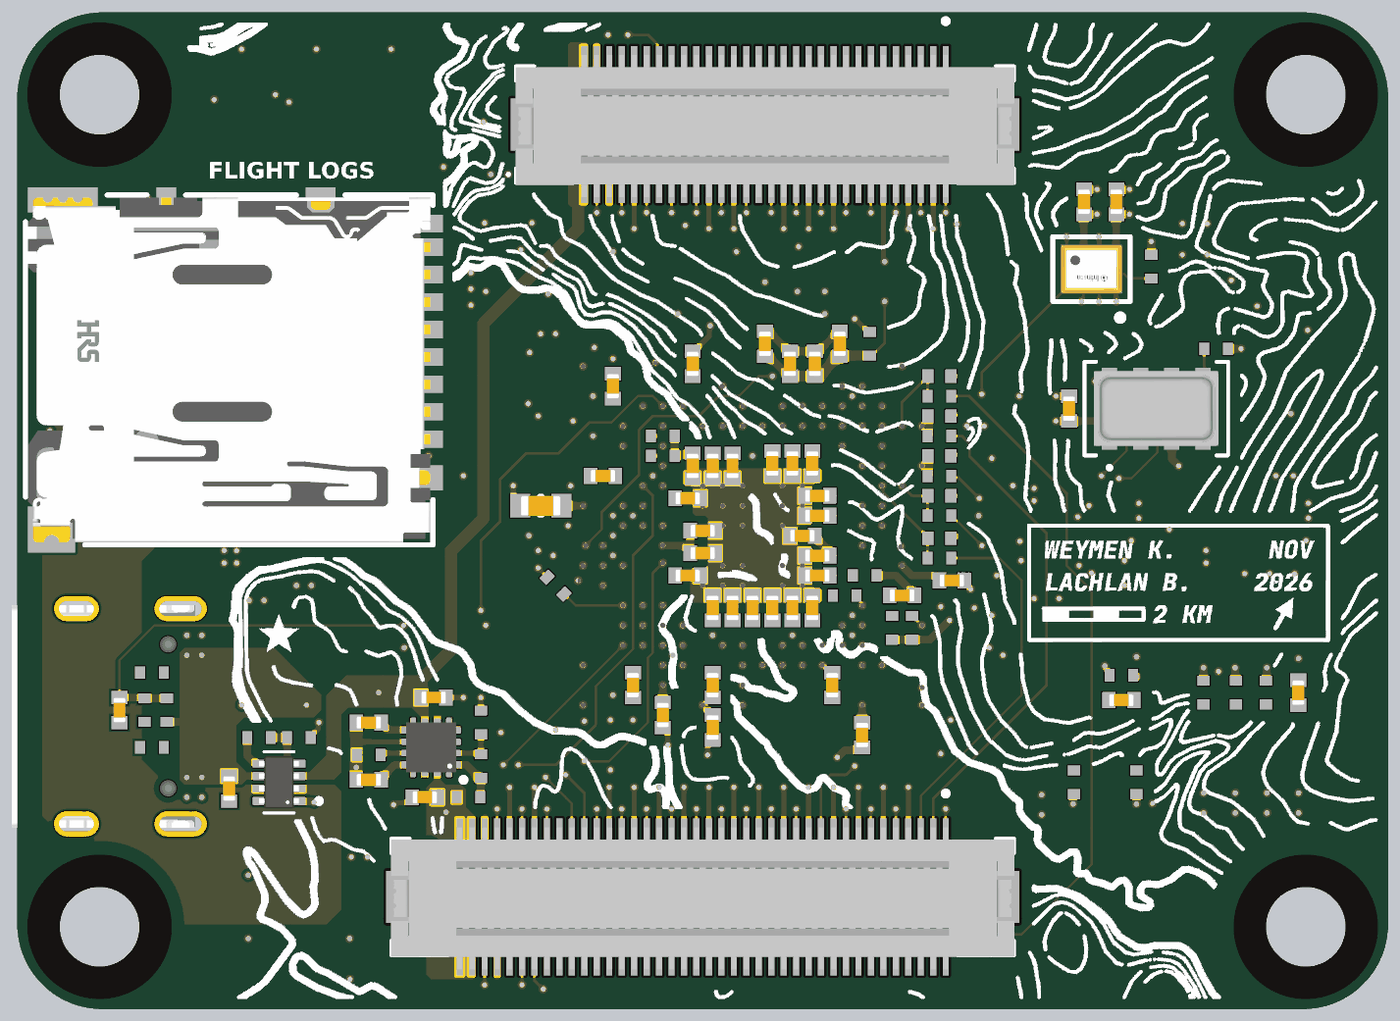
[diagram p11: 3D render of the assembled board from below, using the file's embedded part models]

## Layer stack, top to bottom
Top Solder: solder mask 0.0102, Solder Resist, Dk 3.5
L1: signal copper 0.0356
Dielectric 2: prepreg 0.0711, PP-006, Dk 4.1
L2: signal copper 0.035
Dielectric 4: prepreg 0.0711, PP-006, Dk 4.1
L3: signal copper 0.035
Dielectric 6: prepreg 0.0711, PP-006, Dk 4.1
L4: signal copper 0.035
Dielectric 1: dielectric 0.32, FR-4, Dk 4.8
L5: signal copper 0.035
Dielectric 7: prepreg 0.0711, PP-006, Dk 4.1
L6: signal copper 0.035
Dielectric 5: prepreg 0.0711, PP-006, Dk 4.1
L7: signal copper 0.035
Dielectric 3: prepreg 0.0711, PP-006, Dk 4.1
L8: signal copper 0.0356
Bottom Solder: solder mask 0.0102, Solder Resist, Dk 3.5

## Board outline
3.4,0 51.6,0 ccw(c51.6,3.4) 55,3.4 55,36.6 ccw(c51.6,36.6) 51.6,40 3.4,40 ccw(c3.4,36.6) 0,36.6 0,3.4 ccw(c3.4,3.4)

## Design rules (kind name [scope] priority, off if disabled: settings)
BoardOutlineClearance [not (OnLayer('Top Overlay') or OnLayer('Bottom Overlay'))] p1: gap=0.4 ignorepadtopadclearanceinfootprint=FALSE
Clearance FC_Clr_NPTH [InComponent('J2') Or InComponent('J4') Or InComponent('J5')] p1: gap=0.1 ignorepadtopadclearanceinfootprint=TRUE except(0.25: Arc-Hole Track-Hole SMDPad-Hole THPad-Hole Via-Hole Fill-Hole Poly-Hole Region-Hole Text-Hole)
Clearance FC_Clr_Default [All] p2: gap=0.1 ignorepadtopadclearanceinfootprint=FALSE
Clearance FC_Clr_BGA [WithinRoom('U1_BGA')] p3: gap=0.1 ignorepadtopadclearanceinfootprint=FALSE
Clearance DIFF_Clearance [(InDifferentialPairClass('All Differential Pairs')) vs IsRegion] p4: gap=0.15 ignorepadtopadclearanceinfootprint=TRUE
Clearance [All] p5: gap=0.09 ignorepadtopadclearanceinfootprint=TRUE except(0.1: Arc-SMDPad Track-SMDPad; 0.125: Arc-Via Track-Via; 0.127: SMDPad-SMDPad; 0.15: SMDPad-Text THPad-Text Via-Text Fill-Text Poly-Text Region-Text Text-Text Text-Hole; 0.154: SMDPad-Via; 0.2: Arc-THPad Arc-Hole Track-THPad Track-Hole SMDPad-Hole THPad-Hole)
ComponentClearance FC_ComponentClearance [All] p1: gap=0.2 collisioncheckmode=3 verticalgap=0.254 showdistances=FALSE // Body to body, both sides
ComponentClearance Testpoint [HasFootprint('TP_0.50mm') vs HasFootprint('TP_0.50mm')] p2: gap=0.8 collisioncheckmode=3 verticalgap=0.254 showdistances=FALSE
ComponentClearance Exception_M.2_Standoff [HasFootprint('M.2 E-Key 4.2mm APCI0108-P001A') vs HasFootprint('Spacer_SMD_M3x2.5_TH-0.8-2.5-M3')] p3: gap=0 collisioncheckmode=3 verticalgap=0 showdistances=FALSE
ComponentClearance [All] p4: gap=0.254 collisioncheckmode=3 verticalgap=0.254 showdistances=FALSE
DiffPairsRouting FC_DiffPair [All] p1: maxlimit=0.2 minlimit=0.2 mostfreqgap=0.2 toplayer_minwidth=0.1 toplayer_maxwidth=0.2 toplayer_prefwidth=0.15 midlayer1_minwidth=0.1 midlayer1_maxwidth=0.2 midlayer1_prefwidth=0.15 midlayer2_minwidth=0.1 midlayer2_maxwidth=0.2 midlayer2_prefwidth=0.15 midlayer3_minwidth=0.1 midlayer3_maxwidth=0.2 midlayer3_prefwidth=0.15 midlayer4_minwidth=0.1 midlayer4_maxwidth=0.2 midlayer4_prefwidth=0.15 midlayer5_minwidth=0.1 midlayer5_maxwidth=0.2 midlayer5_prefwidth=0.15 midlayer6_minwidth=0.1 midlayer6_maxwidth=0.2 midlayer6_prefwidth=0.15 bottomlayer_minwidth=0.1 bottomlayer_maxwidth=0.2 bottomlayer_prefwidth=0.15 maxuncoupledlength=10 // PLACEHOLDER width/gap - take from the fab impedance calculator
DiffPairsRouting DiffPairsRouting_100 [InDifferentialPairClass('DIFF100')] p2: maxlimit=5 minlimit=0.1 mostfreqgap=0.2 toplayer_prefgap=0.15 toplayer_minwidth=0.108 toplayer_maxwidth=0.108 toplayer_prefwidth=0.108 midlayer1_minwidth=0.381 midlayer1_maxwidth=0.381 midlayer1_prefwidth=0.381 midlayer2_minwidth=0.381 midlayer2_maxwidth=0.381 midlayer2_prefwidth=0.381 midlayer3_mingap=0.2 midlayer3_minwidth=0.112 midlayer3_maxwidth=0.112 midlayer3_prefwidth=0.112 midlayer4_mingap=0.2 midlayer4_minwidth=0.112 midlayer4_maxwidth=0.112 midlayer4_prefwidth=0.112 midlayer5_minwidth=0.381 midlayer5_maxwidth=0.381 midlayer5_prefwidth=0.381 midlayer6_minwidth=0.381 midlayer6_maxwidth=0.381 midlayer6_prefwidth=0.381 bottomlayer_mingap=0.15 bottomlayer_prefgap=0.15 bottomlayer_minwidth=0.108 bottomlayer_maxwidth=0.108 bottomlayer_prefwidth=0.108 impedanceprofiledriven=TRUE impedanceprofileid={14998AED-97F4-4351-A799-867E61214AE5} maxuncoupledlength=5
DiffPairsRouting DiffPairsRouting_90 [InDifferentialPairClass('DIFF90')] p3: maxlimit=0.3 minlimit=0.1 mostfreqgap=0.15 toplayer_maxgap=0.15 toplayer_minwidth=0.1 toplayer_maxwidth=0.141 toplayer_prefwidth=0.141 midlayer1_minwidth=0.381 midlayer1_maxwidth=0.381 midlayer1_prefwidth=0.381 midlayer2_minwidth=0.381 midlayer2_maxwidth=0.381 midlayer2_prefwidth=0.381 midlayer3_maxgap=0.15 midlayer3_minwidth=0.1 midlayer3_maxwidth=0.129 midlayer3_prefwidth=0.129 midlayer4_maxgap=0.15 midlayer4_minwidth=0.1 midlayer4_maxwidth=0.129 midlayer4_prefwidth=0.129 midlayer5_minwidth=0.381 midlayer5_maxwidth=0.381 midlayer5_prefwidth=0.381 midlayer6_minwidth=0.381 midlayer6_maxwidth=0.381 midlayer6_prefwidth=0.381 bottomlayer_maxgap=0.15 bottomlayer_minwidth=0.1 bottomlayer_maxwidth=0.141 bottomlayer_prefwidth=0.141 impedanceprofiledriven=TRUE impedanceprofileid={F763DD62-148D-4FB0-A8B3-71F72581B7A3} maxuncoupledlength=5
DiffPairsRouting DiffPairsRouting_85 [InDifferentialPairClass('DIFF85')] p4: maxlimit=0.3 minlimit=0.1 mostfreqgap=0.15 toplayer_maxgap=0.15 toplayer_minwidth=0.11 toplayer_maxwidth=0.161 toplayer_prefwidth=0.161 midlayer1_minwidth=0.381 midlayer1_maxwidth=0.381 midlayer1_prefwidth=0.381 midlayer2_minwidth=0.381 midlayer2_maxwidth=0.381 midlayer2_prefwidth=0.381 midlayer3_maxgap=0.15 midlayer3_minwidth=0.11 midlayer3_maxwidth=0.147 midlayer3_prefwidth=0.147 midlayer4_maxgap=0.15 midlayer4_minwidth=0.11 midlayer4_maxwidth=0.147 midlayer4_prefwidth=0.147 midlayer5_minwidth=0.381 midlayer5_maxwidth=0.381 midlayer5_prefwidth=0.381 midlayer6_minwidth=0.381 midlayer6_maxwidth=0.381 midlayer6_prefwidth=0.381 bottomlayer_maxgap=0.15 bottomlayer_minwidth=0.11 bottomlayer_maxwidth=0.161 bottomlayer_prefwidth=0.161 impedanceprofiledriven=TRUE impedanceprofileid={9D260A77-406D-4574-8F8F-E36613C6C459} maxuncoupledlength=5
Height FC_Height_Bottom [OnLayer('Bottom Layer')] p1: minheight=0 maxheight=6.5 prefheight=12.7 // SET to the free space under the board on the carrier
Height FC_Height_Default [All] p2: minheight=0 maxheight=6 prefheight=12.7
Height [All] p3: minheight=0 maxheight=25.4 prefheight=12.7
HoleSize FC_HoleSize [All] p1: absolutevalues=TRUE maxlimit=6.3 minlimit=0.2 maxpercent=80.000 minpercent=20.000
HoleSize HoleSize_Via [IsVia] p2: absolutevalues=TRUE maxlimit=6.3 minlimit=0.2 maxpercent=80.000 minpercent=20.000
HoleSize HoleSize_Pad [IsPad] p3: absolutevalues=TRUE maxlimit=6.3 minlimit=0.5 maxpercent=80.000 minpercent=20.000
HoleSize HoleSize_General [All] p4: absolutevalues=TRUE maxlimit=6.3 minlimit=0.2 maxpercent=80.000 minpercent=20.000
HoleToHoleClearance FC_HoleToHole [All] p1: gap=0.25 allowstackedmicrovias=TRUE
HoleToHoleClearance HoleToHoleClearance_Via [isVia] p2: gap=0.254 allowstackedmicrovias=TRUE
HoleToHoleClearance HoleToHoleClearance_General [All] p3: gap=0.5 allowstackedmicrovias=TRUE
MatchedLengths FC_LenMatch_DiffPair [IsDifferentialPair] p1: tolerance=25.4 checknetsindiffpair=FALSE checkdiffpairvsdiffpair=TRUE checkxsignals=TRUE checkothers=TRUE // Length match inside each differential pair
MatchedLengths MatchLengths_xSignals_J3_J4 [InxSignalClass('xSignals_J3_J4_MatchLengthsClass')] p2: tolerance=2.54 checknetsindiffpair=FALSE checkdiffpairvsdiffpair=TRUE checkxsignals=TRUE checkothers=TRUE
MatchedLengths xPCIe_intraPair [InxSignalClass('xPCIe')] p3: tolerance=25.4 checknetsindiffpair=TRUE checkdiffpairvsdiffpair=FALSE checkxsignals=FALSE checkothers=FALSE usedelayunits=TRUE delaytolerance=1.000000 phasematching=TRUE phasedelaytolerance=1.000000 phasedistance=12.7
MatchedLengths xPCIe_interPair [InxSignalClass('xPCIe')] p4: tolerance=2.54 checknetsindiffpair=FALSE checkdiffpairvsdiffpair=TRUE checkxsignals=TRUE checkothers=TRUE usedelayunits=TRUE delaytolerance=1.000000
MatchedLengths xCSI [InxSignalClass('xCSI')] p5: tolerance=0.5 checknetsindiffpair=FALSE checkdiffpairvsdiffpair=TRUE checkxsignals=TRUE checkothers=TRUE usedelayunits=TRUE delaytolerance=2.000000
MinimumAnnularRing FC_AnnularRing [All] p1: minimumring=0.07
MinimumAnnularRing MinimumAnnularRing_Pad [IsPad] p2: minimumring=0.25
MinimumAnnularRing MinimumAnnularRing_Via [IsVia] p3: minimumring=0.1
MinimumAnnularRing MinimumAnnularRing_General [not isVia] p4: minimumring=0.2
MinimumSolderMaskSliver FC_MaskSliver [All] p1: minsoldermaskwidth=0.04
MinimumSolderMaskSliver MinimumSolderMaskSliver_Exception [HasFootprint('BOARD-TO-BOARD 62POL_20698-062E-01')] p2: minsoldermaskwidth=0.04
MinimumSolderMaskSliver [All] p3: minsoldermaskwidth=0.04
NetAntennae FC_NetAntennae [All] p1: netantennaetolerance=0 // Flags dangling track stubs
NetAntennae [All] p2: netantennaetolerance=0
PasteMaskExpansion FC_Paste_Default [All] p1: expansion=0 // Paste = pad size; BGA stencil opening 0.40 mm per ST
PasteMaskExpansion [All] p2: expansion=0
PlaneClearance FC_PlaneClr_Default [All] p1: clearance=0.15
PlaneClearance FC_PlaneClr_BGA [WithinRoom('U1_BGA')] p2: clearance=0.125
PlaneClearance [All] p3: clearance=0.508
PlaneConnect FC_PlaneConn_Default [All] p1: planeconnectstyle=Relief reliefexpansion=0.25 reliefentries=4 reliefconductorwidth=0.25 reliefairgap=0.25
PlaneConnect FC_PlaneConn_Vias [IsVia] p2: planeconnectstyle=Direct reliefexpansion=0.25 reliefentries=4 reliefconductorwidth=0.25 reliefairgap=0.25
PlaneConnect [All] p3: planeconnectstyle=Direct reliefexpansion=0.508 reliefentries=4 reliefconductorwidth=0.254 reliefairgap=0.254
PolygonConnect FC_PolyConn_Default [All] p1: connectstyle=Direct reliefconductorwidth=0.254 reliefentries=4 polygonreliefangle="90 Angle" airgapwidth=0.254
PolygonConnect FC_PolyConn_Vias [IsVia] p2: connectstyle=Direct reliefconductorwidth=0.254 reliefentries=4 polygonreliefangle="90 Angle" airgapwidth=0.254
PolygonConnect [All] p3: connectstyle=Direct reliefconductorwidth=0.254 reliefentries=4 polygonreliefangle="90 Angle" airgapwidth=0.254
RoomDefinition U1_BGA [InComponent('U1')] p1: confinementstyle=ConfineIn formatcopy=TRUE lockcomponents=FALSE outline 17.5,27 33.5,27 33.5,11 17.5,11
RoutingVias FC_Via_Power [InNetClass('PWR')] p1: holewidth=0.3 width=0.55 viastyle="Through Hole" minholewidth=0.2 minwidth=0.35 maxholewidth=0.3 maxwidth=0.55 // Power vias
RoutingVias FC_Via_Default [All] p2: holewidth=0.2 width=0.4 viastyle="Through Hole" minholewidth=0.2 minwidth=0.35 maxholewidth=0.3 maxwidth=0.55 // Default signal via
RoutingVias FC_Via_BGA [WithinRoom('U1_BGA')] p3: holewidth=0.2 width=0.35 viastyle="Through Hole" minholewidth=0.2 minwidth=0.35 maxholewidth=0.2 maxwidth=0.35 // BGA via-in-pad, filled and capped
RoutingVias [All] p4: holewidth=0.2 width=0.4 viastyle="Through Hole" minholewidth=0.2 minwidth=0.4 maxholewidth=6.3 maxwidth=6.5
SilkToSilkClearance [All] p1: silktosilkclearance=0
SilkToSilkClearance FC_SilkToSilk [All] p2: silktosilkclearance=0
SilkToSolderMaskClearance [IsPad] p1: minsilkscreentomaskgap=0 clearancetoexposedcopper=TRUE
SilkToSolderMaskClearance FC_SilkToMask [All] p2: minsilkscreentomaskgap=0 clearancetoexposedcopper=TRUE
SolderMaskExpansion FC_Mask_Default [All] p1: expansion=0.05 istentingtop=FALSE
SolderMaskExpansion FC_Mask_Vias [IsVia] p2: expansion=0.05 istentingtop=FALSE
SolderMaskExpansion [All] p3: expansion=0.05 istentingtop=FALSE
SupplyNets "Schematic Supply Nets_27" [InNet('VBUS')] p1: voltage=0.000
SupplyNets "Schematic Supply Nets_26" [InNet('+VMUX')] p2: voltage=0.000
SupplyNets "Schematic Supply Nets_25" [InNet('VCAPDSI')] p3: voltage=0.000
SupplyNets "Schematic Supply Nets_24" [InNet('+D3V3')] p4: voltage=0.000
SupplyNets "Schematic Supply Nets_23" [InNet('VCORE')] p5: voltage=0.000
SupplyNets "Schematic Supply Nets_22" [InNet('VLXSMPS')] p6: voltage=0.000
SupplyNets "Schematic Supply Nets_21" [InNet('+3V3LDO')] p7: voltage=0.000
SupplyNets "Schematic Supply Nets_20" [InNet('+5V_EFUSE')] p8: voltage=0.000
SupplyNets "Schematic Supply Nets_19" [InNet('+VCARRIER')] p9: voltage=0.000
SupplyNets "Schematic Supply Nets_18" [InNet('GND')] p10: voltage=0.000
SupplyNets "Schematic Supply Nets_17" [InNet('+A3V3')] p11: voltage=0.000
SupplyNets "Schematic Supply Nets_16" [InNet('VBUS')] p12: voltage=0.000
SupplyNets "Schematic Supply Nets_15" [InNet('VLXSMPS')] p13: voltage=0.000
SupplyNets "Schematic Supply Nets_14" [InNet('+3V3LDO')] p14: voltage=0.000
SupplyNets "Schematic Supply Nets_13" [InNet('+LDO3V3')] p15: voltage=0.000
SupplyNets "Schematic Supply Nets_12" [InNet('+D3V3')] p16: voltage=0.000
SupplyNets "Schematic Supply Nets_11" [InNet('+5VUSB')] p17: voltage=0.000
SupplyNets "Schematic Supply Nets_10" [InNet('VBUS')] p18: voltage=0.000
SupplyNets "Schematic Supply Nets_9" [InNet('+A3V3')] p19: voltage=0.000
SupplyNets "Schematic Supply Nets_8" [InNet('+5V_EFUSE')] p20: voltage=0.000
SupplyNets "Schematic Supply Nets_7" [InNet('+VCARRIER')] p21: voltage=0.000
SupplyNets "Schematic Supply Nets_6" [InNet('VCORE')] p22: voltage=0.000
SupplyNets "Schematic Supply Nets_5" [InNet('GND')] p23: voltage=0.000
SupplyNets "Schematic Supply Nets_4" [InNet('+VMUX')] p24: voltage=0.000
SupplyNets "Schematic Supply Nets_3" [InNet('VCAPDSI')] p25: voltage=0.000
SupplyNets "Schematic Supply Nets_2" [InNet('GND')] p26: voltage=0.000
SupplyNets "Schematic Supply Nets_1" [InNet('VCC1.8')] p27: voltage=0.000
SupplyNets "Schematic Supply Nets" [InNet('VCC3.3')] p28: voltage=0.000
Width FC_Width_Default [All] p1: maxlimit=0.5 minlimit=0.1 preferedwidth=0.15
Width FC_Width_Power [InNetClass('PWR')] p2: maxlimit=2 minlimit=0.2 preferedwidth=0.4
Width FC_Width_BGA [WithinRoom('U1_BGA')] p3: maxlimit=0.3 minlimit=0.1 preferedwidth=0.1
Width Width_S50 [InNetClass('SNGL_50')] p4: maxlimit=0.3 minlimit=0.1 preferedwidth=0.3 toplayer_maxwidth=0.156 toplayer_prefwidth=0.156 midlayer3_maxwidth=0.142 midlayer3_prefwidth=0.142 midlayer4_maxwidth=0.142 midlayer4_prefwidth=0.142 bottomlayer_maxwidth=0.156 bottomlayer_prefwidth=0.156 minimp=50.000000 maximp=50.000000 favimp=50.000000
Width Width_General [All] p5: maxlimit=10 minlimit=0.1 preferedwidth=0.2 midlayer3_minwidth=0.127 midlayer4_minwidth=0.127 midlayer5_minwidth=0.127 midlayer6_minwidth=0.127 minimp=50.000000 maximp=50.000000 favimp=50.000000
18 further rules are at their usual default settings.

## Classes and differential pairs
component class U_Power: C57 C58 C59 C60 C61 C63 C64 C66 C77 L2 R17 R18 R19 R20 R26 R27 R28 R29 TP2 TP3 TP4 TP5 TP6 TP7 TP8 U5 U12 U13 U14
net class PAY_IO[1..17]: PAY_IO1 PAY_IO2 PAY_IO3 PAY_IO4 PAY_IO5 PAY_IO6 PAY_IO7 PAY_IO8 PAY_IO9 PAY_IO10 PAY_IO11 PAY_IO12 PAY_IO13 PAY_IO14 PAY_IO15 PAY_IO16 PAY_IO17
net class PAY_AN[1..16]: PAY_AN1 PAY_AN2 PAY_AN3 PAY_AN4 PAY_AN5 PAY_AN6 PAY_AN7 PAY_AN8 PAY_AN9 PAY_AN10 PAY_AN11 PAY_AN12 PAY_AN13 PAY_AN14 PAY_AN15 PAY_AN16
net class J1_GPIO[1..6]: J1_GPIO1 J1_GPIO2 J1_GPIO3 J1_GPIO4 J1_GPIO5 J1_GPIO6
net class FMU_CH[1..16]: FMU_CH1 FMU_CH2 FMU_CH3 FMU_CH4 FMU_CH5 FMU_CH6 FMU_CH7 FMU_CH8 FMU_CH9 FMU_CH10 FMU_CH11 FMU_CH12 FMU_CH13 FMU_CH14 FMU_CH15 FMU_CH16
component class U_Interface_Conn2_Carrier_Board: J5 R39 R40 R41
component class U_Interface_Conn1_Carrier_Board: J4 R35 R36 R37 R38
component class U_Comms_CAN2: C49 U9
component class U_Comms_CAN1: C48 U8
component class U_Button_and_LEDs: D1 D2 D3 R23 R24 R25
component class Top: MH1 MH2 MH3 MH4
component class U_Sensor_LSM6DSV32X: C44 C45 C54 R22 U2
component class U_Sensor_LIS2MDL: C53 C55 C56 U4
component class U_Sensor2_MS5611: C68 R33 U11
component class U_Sensor2_ICM-42688-P: C69 C70 C71 R10 R34 U10
component class U_MCU_IO: C72 C73 C74 C75 C76 R42 R43 R44 R45 R46 TP1 TP11 TP12 TP13 TP14 TP15 TP16 TP17 TP18 TP19 TP20 TP21 TP22 U1
component class U_Interface_Debug: C78 J2 J3 R31 R32 R47 R48 U15
component class U_Memory_FRAM: C46 R11 R12 R13 U6
component class U_Memory_EEPROM: C47 R14 R15 R16 U7
component class U_Sensor_DPS368: C50 C51 R21 U3
component class U_Memory_microSD: C43 C52 J1 R2 R3 R4 R6 R7 R8 R9
component class U_MCU_Power: C1 C2 C3 C4 C5 C6 C7 C8 C9 C10 C11 C12 C13 C14 C15 C16 C17 C18 C19 C20 C21 C22 C23 C24 C25 C26 C27 C28 C29 C30 C31 C32 C33 C34 C35 C36 C37 C38 C39 C40 C41 C42 L1 R1 R5 SW1 SW2 TP9 TP10 X1
differential pair USB: +USB_P -USB_N
differential pair USBD: +USBD_P -USBD_N
differential pair CAN2: +CAN2_P -CAN2_N
differential pair CAN1: +CAN1_P -CAN1_N

## Components (designator, comment, footprint, x,y, rotation, side; value= is the part's Value field where it differs from the comment)
C1 "4u7" CAPC1005X05N 27.9,25.9 r90 bottom locked
C2 "100n" CAPC1005X05N 28.1,20.5 r180 bottom locked
C3 "100n" CAPC1005X05N 27.5,19.2 r180 bottom locked
C4 "100n" CAPC1005X05N 28.1,17.4 r180 bottom locked
C5 "100n" CAPC1005X05N 27.9,21.8 r270 bottom locked
C6 "100n" CAPC1005X05N 23.5,19 r0 bottom locked
C7 "100n" CAPC1005X05N 22.9,19.8 r0 bottom locked
C8 "100n" CAPC1005X05N 22.9,20.6 r0 bottom locked
C9 "100n" CAPC1005X05N 23.1,21.9 r270 bottom locked
C10 "100n" CAPC1005X05N 24.7,21.9 r270 bottom locked
C11 "100n" CAPC1005X05N 27.1,21.8 r270 bottom locked
C12 "4u7" CAPC1005X05N 27.5,18.3 r180 bottom locked
C13 "100n" CAPC1005X05N 22.9,17.4 r0 bottom locked
C14 "100n" CAPC1005X05N 22.9,18.2 r0 bottom locked
C15 "100n" CAPC1005X05N 23.1,16.1 r90 bottom locked
C16 "100n" CAPC1005X05N 23.9,16.1 r90 bottom locked
C17 "100n" CAPC1005X05N 23.9,21.9 r270 bottom locked
C18 "100n" CAPC1005X05N 24.7,16.1 r90 bottom locked
C19 "100n" CAPC1005X05N 25.5,16.1 r90 bottom locked
C20 "100n" CAPC1005X05N 26.3,16.1 r90 bottom locked
C21 "100n" CAPC1005X05N 27.1,16.1 r90 bottom locked
C22 "100n" CAPC1005X05N 26.3,21.8 r270 bottom locked
C23 "10u" CAPC1608X08N 34,20.2 r0 bottom
C24 "1u" CAPC1005X05N 33.7,28.2 r90 top
C25 "100n" CAPC1005X05N 30.3,13 r90 bottom locked
C26 "100n" CAPC1005X05N 19.5,16.6 r0 bottom locked
C27 "100n" CAPC1005X05N 31.5,21.4 r180 bottom locked
C28 "100n" CAPC1005X05N 21.1,11 r270 bottom
C29 "2u2" CAPC1005X05N 17.5,17.2 r180 bottom
C30 "100n" CAPC1005X05N 27.1,13 r90 bottom locked
C31 "2u2" CAPC1005X05N 29.1,11.8 r270 bottom
C32 "2u2" CAPC1005X05N 22.3,13 r90 bottom locked
C33 "100n" CAPC1005X05N 24,25.9 r90 bottom locked
C34 "1u" CAPC1005X05N 27.1,11.3 r270 bottom
C35 "100n" CAPC1005X05N 23,25.9 r90 bottom locked
C36 "100n" CAPC1005X05N 22.6,28.3 r90 top
C37 "100n" CAPC1005X05N 31.1,25 r270 bottom locked
C38 "15p" CAPC1005X05N 23.7,28.3 r90 top
C39 "15p" CAPC1005X05N 28.5,28.4 r270 top
C40 "220p" CAPC1005X05N 30.6,30.4 r180 top
C41 "1u" CAPC1005X05N 22,26.7 r90 bottom locked
C42 "1u" CAPC1005X05N 25,26.7 r90 bottom locked
C43 "100n" CAPC1005X05N 40,26.2 r0 top
C44 "100n" CAPC1005X05N 6.25,18 r180 top
C45 "100n" CAPC1005X05N 4.25,18 r0 top
C46 "100n" CAPC1005X05N 10.7,12.4 r0 bottom
C47 "100n" CAPC1005X05N 3.6,12.7 r270 bottom
C48 "100n" CAPC1005X05N 38.8,4.1 r270 top
C49 "100n" CAPC1005X05N 35.3,31 r180 top
C50 "100n" CAPC1005X05N 12.2,32.4 r90 bottom
C51 "100n" CAPC1005X05N 10.9,32.4 r90 bottom
C52 "10u" CAPC1608X08N 40.3,27.6 r0 top
C53 "1u" CAPC1005X05N 7.75,29.75 r0 top
C54 "1u" CAPC1005X05N 7.75,19.25 r0 top
C55 "100n" CAPC1005X05N 7.75,31 r0 top
C56 "220n" CAPC1005X05N 4.25,27.25 r180 top
C57 "1u" CAPC1005X05N 38.65,8.5 r0 bottom
C58 "1u" CAPC1005X05N 46.5,8.85 r270 bottom
C59 "1u" CAPC1005X05N 46.7,28 r180 top
C60 "1u" CAPC1005X05N 46.7,24.45 r180 top
C61 "22n" CAPC1005X05N 40.9,9.2 r0 bottom
C63 "1u" CAPC1005X05N 38.3,12.5 r180 bottom
C64 "10u" CAPC1608X08N 40.9,20.4 r90 top
C66 "22u" CAPC1608X08N 45.4,17.3 r270 top
C68 "100n" CAPC1005X05N 12.8,24.1 r90 bottom
C69 "100n" CAPC1005X05N 14.2,17.5 r270 top
C70 "2u2" CAPC1005X05N 13.2,17.5 r270 top
C71 "10n" CAPC1005X05N 11.1,17.5 r270 top
C72 "100n" "IPC C C0402 NO SILK" 18,25.4 r180 bottom locked
C73 "100n" "IPC C C0402 NO SILK" 18,23.8 r180 bottom locked
C74 "100n" "IPC C C0402 NO SILK" 18,18.9 r180 bottom locked
C75 "100n" "IPC C C0402 NO SILK" 18,20.6 r180 bottom locked
C76 "100n" "IPC C C0402 NO SILK" 18,22.2 r180 bottom locked
C77 "10n" CAPC1005X05N 40.9,11.5 r0 bottom
C78 "100n" CAPC1005X05N 50.9,12 r270 bottom
D1 "C165983" LED_0603_YELLOW 46,37.5 r270 top
D2 "C165983" LED_0603_YELLOW 43,37.5 r270 top
D3 "C165983" LED_0603_YELLOW 40,37.5 r270 top
J1 "DM3AT-SF-PEJM5" FP-DM3AT-SF-PEJM5-MFG 46.5,25.65 r270 bottom locked
J2 "USB4105-GF-A-060" USB4105-GF-A-060 50.25,11.75 r90 top locked
J3 "FTS-103-01-F-DV-TR" FP-FTS-103-01-F-DV-TR-MFG 43.7,4.1 r90 top
J4 "DF17(4.0)-80DP-0.5V(57)" HRS_DF17(4.0)-80DP-0.5V(57) 27.5,4.5 r0 bottom locked
J5 "DF17(4.0)-60DP-0.5V(57)" HRS_DF17(4.0)-60DP-0.5V(57) 25,35.5 r0 bottom locked
L1 "2u2" FP-DFE252012C-IPC_B 31.1,28.2 r180 top
L2 "2u2" FP-DFE252012C-IPC_B 44.2,20.5 r0 top
MH1 "MH_M3_NPTH_3.2_MO6.0_KO6.5" MH_M3_NPTH_7mmKO-Footprint-1 3.3,36.7 r0 top locked
MH2 "MH_M3_NPTH_3.2_MO6.0_KO6.5" MH_M3_NPTH_7mmKO-Footprint-1 51.7,36.7 r0 top locked
MH3 "MH_M3_NPTH_3.2_MO6.0_KO6.5" MH_M3_NPTH_7mmKO-Footprint-1 51.7,3.3 r0 top locked
MH4 "MH_M3_NPTH_3.2_MO6.0_KO6.5" MH_M3_NPTH_7mmKO-Footprint-1 3.3,3.3 r0 top locked
R1 "10R" "IPC C R0402 NO SILK" 20.8,26.7 r90 bottom
R2 "10k" "IPC C R0402 NO SILK" 40,25 r0 top
R3 "10k" "IPC C R0402 NO SILK" 40,23.9 r0 top
R4 "10k" "IPC C R0402 NO SILK" 40,22.8 r0 top
R5 "10k" "IPC C R0402 NO SILK" 50.8,26.5 r180 top
R6 "10k" "IPC C R0402 NO SILK" 40,30.5 r0 top
R7 "10k" "IPC C R0402 NO SILK" 40,29.4 r0 top
R8 "10k" "IPC C R0402 NO SILK" 47.7,32.5 r180 top
R9 "22R" "IPC C R0402 NO SILK" 33.4,17 r225 bottom
R10 "0R" "IPC C R0402 NO SILK" 14.25,19.25 r90 top
R11 "10k" "IPC C R0402 NO SILK" 10.7,13.4 r180 bottom
R12 "10k" "IPC C R0402 NO SILK" 12.6,9.1 r90 bottom
R13 "10k" "IPC C R0402 NO SILK" 10.1,9.1 r90 bottom
R14 "10k" "IPC C R0402 NO SILK" 4.9,12.7 r270 bottom
R15 "2k2" "IPC C R0402 NO SILK" 7.4,12.7 r270 bottom
R16 "2k2" "IPC C R0402 NO SILK" 6.1,12.7 r270 bottom
R17 "357k" "IPC C R0402 NO SILK" 36.9,8.5 r0 bottom
R18 "249k" "IPC C R0402 NO SILK" 45.3,10.9 r0 bottom
R19 "3k" "IPC C R0402 NO SILK" 40.9,10.2 r0 bottom
R20 "33k2" "IPC C R0402 NO SILK" 36.4,9.75 r270 bottom
R21 "10k" "IPC C R0402 NO SILK" 9.5,29.8 r90 bottom
R22 "10k" "IPC C R0402 NO SILK" 7.25,20.75 r270 top
R23 "1k" "IPC C R0402 NO SILK" 47.1,37.5 r270 top
R24 "1k" "IPC C R0402 NO SILK" 44.1,37.5 r270 top
R25 "1k" "IPC C R0402 NO SILK" 41.1,37.5 r270 top
R26 "100k" "IPC C R0402 NO SILK" 43.7,10.9 r0 bottom
R27 "110k" "IPC C R0402 NO SILK" 36.4,11.5 r270 bottom
R28 "453k" "IPC C R0402 NO SILK" 41.7,14.5 r0 top
R29 "100k" "IPC C R0402 NO SILK" 39.95,14.5 r0 top
R31 "5k1" "IPC C R0402 NO SILK" 49.6,10.5 r0 bottom
R32 "5k1" "IPC C R0402 NO SILK" 49.6,13.5 r0 bottom
R33 "10k" "IPC C R0402 NO SILK" 6.9,26.5 r0 bottom
R34 "10k" "IPC C R0402 NO SILK" 16.9,19.8 r180 top
R35 "2k2" "IPC C R0402 NO SILK" 21,17.4 r180 bottom locked
R36 "2k2" "IPC C R0402 NO SILK" 21.8,16.6 r0 bottom locked
R37 "2k2" "IPC C R0402 NO SILK" 19.1,15.3 r270 bottom locked
R38 "2k2" "IPC C R0402 NO SILK" 19.9,15.3 r270 bottom locked
R39 "2k2" "IPC C R0402 NO SILK" 29.1,22.2 r180 bottom locked
R40 "2k2" "IPC C R0402 NO SILK" 29.1,23 r180 bottom locked
R41 "10k" "IPC C R0402 NO SILK" 34,19 r0 top
R42 "1k" "IPC C R0402 NO SILK" 18,24.6 r180 bottom locked
R43 "1k" "IPC C R0402 NO SILK" 18,23 r180 bottom locked
R44 "1k" "IPC C R0402 NO SILK" 18,18.1 r180 bottom locked
R45 "1k" "IPC C R0402 NO SILK" 18,19.8 r180 bottom locked
R46 "1k" "IPC C R0402 NO SILK" 18,21.4 r180 bottom locked
R47 "10k" "IPC C R0402 NO SILK" 49,12 r270 bottom
R48 "15k" "IPC C R0402 NO SILK" 49.9,12 r270 bottom
SW1 "B3U-1000P" FP-B3U-1000P-MFG 52,28.5 r0 top
SW2 "B3U-1000P" FP-B3U-1000P-MFG 52,22.7 r0 top
TP1 "Test Pad" PCBComponent_1 29.2,35.7 r90 top
TP2 "Test Pad" PCBComponent_1 45.4,9.8 r90 top
TP3 "Test Pad" PCBComponent_1 37.8,7.9 r90 top
TP4 "Test Pad" PCBComponent_1 40.5,12.7 r90 top
TP5 "Test Pad" PCBComponent_1 39.4,19.6 r90 top
TP6 "Test Pad" PCBComponent_1 47.3,29.6 r90 top
TP7 "Test Pad" PCBComponent_1 27.3,4.8 r90 top
TP8 "Test Pad" PCBComponent_1 3.9,23.9 r90 top
TP9 "Test Pad" PCBComponent_1 20.2,28.4 r90 top
TP10 "Test Pad" PCBComponent_1 41.4,9.7 r90 top
TP11 "Test Pad" PCBComponent_1 31.2,6.9 r90 top
TP12 "Test Pad" PCBComponent_1 31.2,4.8 r90 top
TP13 "Test Pad" PCBComponent_1 20.2,30 r90 top
TP14 "Test Pad" PCBComponent_1 27.5,35.7 r90 top
TP15 "Test Pad" PCBComponent_1 5.3,16.5 r90 top
TP16 "Test Pad" PCBComponent_1 2.5,23.9 r90 top
TP17 "Test Pad" PCBComponent_1 1.9,21 r90 top
TP18 "Test Pad" PCBComponent_1 9.9,17.5 r90 top
TP19 "Test Pad" PCBComponent_1 11.3,24.2 r90 top
TP20 "Test Pad" PCBComponent_1 8.1,25.3 r90 top
TP21 "Test Pad" PCBComponent_1 6.4,24.5 r90 top
TP22 "Test Pad" PCBComponent_1 25.5,9.9 r90 top
U1 "STM32H757XIH6" FP-TFBGA2650-A07U-MFG 25.5,19 r270 top locked
U2 "LSM6DSV32XTR" LGA-14L_L3.0-W2.5-P0.50-TL 5,20 r0 top
U3 "DPS368XTSA1" FP-PG-VLGA-8-MFG 11.9,29.7 r270 bottom
U4 "LIS2MDLTR" FP-LGA-12-DM00170568-MFG 5,29.5 r0 top locked
U5 "TLV62569DBVR" FP-DBV0005A-MFG 42.2,17 r180 top
U6 "FM25V02A-GTR" SOIC127P602X173-8N-1-V 12,11 r90 top locked
U7 "M24C64-RMN6TP" SOIC127P600X175-8N 5.5,11 r90 top locked
U8 "TCAN3414DRBR" XCVR_TCAN3414DRBR 36.3,4.1 r180 top
U9 "TCAN3414DRBR" XCVR_TCAN3414DRBR 35.3,33.5 r90 top
U10 "ICM-42688-P" PQFN50P300X250X97-14N 12,20 r0 top
U11 "MS561101BA03-50" SON8_MS5611_TEC 9.3,24.1 r90 bottom
U12 "TPS7A2033DQNR" DQN0004A-MFG 46.7,26.2 r270 top
U13 "TPS2116DRLR" SOTFL50P160X60-8N 44.5,9.1 r0 bottom
U14 "TPS259474ARPWR" IC_TPS259474ARPWR 38.4,10.5 r0 bottom
U15 "USBLC6-2P6" SOT50P160X60-6N 44.7,12.2 r180 top
X1 "Crystal 25MHz X322525MOB4SI" OSC-SMD_4P-L3.2-W2.5-BL 26.1,28.3 r0 top value=25MHz

## Footprints (in the part's own frame and the unit in brackets; to place one, negate y for a bottom-side part, rotate by r counter-clockwise, add the part's x,y. Pads: shape width x height; smd on the part's side, far side on the other; paste and mask are expansions set on the pad)
CAPC1005X05N [mm] "Chip Capacitor, 2-Leads, Body 1.00x0.50mm, IPC Medium Density"
  rect 0.54x0.64 smd: 1(-0.5,0) 2(0.5,0)
  body extent -0.5,-0.25 0.5,0.25, height 0.5
CAPC1608X08N [mm] "Chip Capacitor, 2-Leads, Body 1.60x0.80mm, IPC Medium Density"
  rect 0.8x0.95 smd: 1(-0.825,0) 2(0.825,0)
  silkscreen extent -0.05,-0.38 0.05,0.38, body extent -0.8,-0.4 0.8,0.4, height 0.8
DQN0004A-MFG [mm]
  round 0.279 smd paste-0.127 mask-0.127: 1(-0.505,0.33) 2(-0.505,-0.33)
  round 0.251 smd paste-0.113 mask-0.114: 3(0.459,-0.346) 4(0.459,0.346)
  rect 0.58x0.58 smd rot 135 paste-0.277 mask-0.279: 5(0,0)
  L1 region: -0.66,-0.175 -0.66,-0.485 -0.2,-0.485 -0.2,-0.385 -0.41,-0.175
  L1 region: -0.66,0.175 -0.66,0.485 -0.2,0.485 -0.2,0.385 -0.41,0.175
  L1 region: 0.66,0.175 0.66,0.485 0.2,0.485 0.2,0.385 0.41,0.175
  L1 region: 0.66,-0.175 0.66,-0.485 0.2,-0.485 0.2,-0.385 0.41,-0.175
  silkscreen extent -1.14,-0.9 0.53,1.01, body extent -0.5,-0.5 0.5,0.5, height 0.25
FP-B3U-1000P-MFG [mm]
  rect 0.8x1.7 smd paste+0 mask+0: 1(-1.7,0) 2(1.7,0)
  silkscreen extent -1.6,-1.35 1.6,1.35, body extent -2.2,-1.45 2.2,1.45, height 0.25
FP-DBV0005A-MFG [mm]
  rrect17% 1.1x0.6 smd paste+0 mask+0: 1(-1.3,0.95) 2(-1.3,0) 3(-1.3,-0.95) 4(1.3,-0.95) 5(1.3,0.95)
  silkscreen extent -0.38,-1.53 0.87,1.53, body extent -1.95,-1.78 1.95,1.78, height 0.25
FP-DFE252012C-IPC_B [mm]
  rect 1.355x2.206 smd paste+0 mask+0: 1(-1.026,0) 2(1.026,0)
  silkscreen extent -1.7,-1.5 1.7,1.5, body extent -1.95,-1.35 1.95,1.35, height 0.25
FP-DM3AT-SF-PEJM5-MFG [mm]
  rect 0.7x1.2 smd paste+0 mask+0: 1(2.775,7.975) 2(1.675,7.975) 3(0.575,7.975) 4(-0.525,7.975) 5(-1.625,7.975) 6(-2.725,7.975) 7(-3.825,7.975) 8(-4.925,7.975) 9(-5.875,7.975)
  rect 1x0.8 smd paste+0 mask+0: 10(-6.825,-2.525)
  rect 1x1.2 smd paste+0 mask+0: 11(4.325,7.975) 12(-6.825,3.675)
  rect 1x2.8 smd paste+0 mask+0: 13(-6.825,-6.675)
  round 1.145 smd paste+0 mask+0: 14(6.689,-7.439)
  L1 region: 6.025,-6.175 7.325,-6.175 7.325,-8.075 5.475,-8.075 5.475,-7.725 5.875,-7.725 6.025,-7.575 6.025,-6.175
  L1 keep-out region: -7.225,2.667 -6.475,2.667 -6.475,-0.525 -7.225,-0.525
  L1 keep-out region: -7.225,7.525 -6.475,7.525 -6.475,4.445 -7.225,4.445
  L1 keep-out region: -5.425,2.975 3.275,2.975 3.275,1.375 -5.425,1.375
  L1 keep-out region: -6.125,1.675 -5.425,1.675 -5.425,-5.925 -6.125,-5.925
  L1 keep-out region: 2.925,-6.725 5.207,-6.725 5.207,-8.075 2.925,-8.075
  silkscreen extent -7.02,-8.18 7.02,8.18, body extent -6.93,-8.07 6.92,8.08, height 1.83
FP-FTS-103-01-F-DV-TR-MFG [mm]
  rect 0.74x2.79 smd paste+0 mask+0: 1(-1.27,-2.035) 2(-1.27,2.035) 3(0,-2.035) 4(0,2.035) 5(1.27,-2.035) 6(1.27,2.035)
  silkscreen extent -2.03,-4.12 2.03,1.78, body extent -2.13,-3.53 2.13,3.53, height 0.25
FP-LGA-12-DM00170568-MFG [mm]
  rect 0.375x0.35 smd paste+0 mask+0: 1(-0.763,0.75) 2(-0.763,0.25) 3(-0.763,-0.25) 4(-0.763,-0.75) 7(0.763,-0.75) 8(0.763,-0.25) 9(0.763,0.25) 10(0.763,0.75)
  rect 0.35x0.375 smd paste+0 mask+0: 5(-0.25,-0.763) 6(0.25,-0.763) 11(0.25,0.763) 12(-0.25,0.763)
  silkscreen extent -2.07,-1.35 1.35,1.35, body extent -1.55,-1.55 1.55,1.55, height 0.25
FP-PG-VLGA-8-MFG [mm]
  rect 0.35x0.35 smd paste-1000 mask+0: 1(0.725,0.975) 2(0.725,0.325) 3(0.725,-0.325) 4(0.725,-0.975) 5(-0.725,-0.975) 6(-0.725,-0.325) 7(-0.725,0.325) 8(-0.725,0.975)
  silkscreen extent -1.3,-1.55 2.07,1.55, body extent -1,-1.25 1,1.25, height 1.1
FP-TFBGA2650-A07U-MFG [mm]
  round 0.4 smd paste+0 mask+0: A1(-6.4,6.4) A2(-5.6,6.4) A3(-4.8,6.4) A4(-4,6.4) A5(-3.2,6.4) A6(-2.4,6.4) A7(-1.6,6.4) A8(-0.8,6.4) A9(0,6.4) A10(0.8,6.4) A11(1.6,6.4) A12(2.4,6.4) A13(3.2,6.4) A14(4,6.4) A15(4.8,6.4) A16(5.6,6.4) A17(6.4,6.4) B1(-6.4,5.6) B2(-5.6,5.6) B3(-4.8,5.6) B4(-4,5.6) B5(-3.2,5.6) B6(-2.4,5.6) B7(-1.6,5.6) B8(-0.8,5.6) B9(0,5.6) B10(0.8,5.6) B11(1.6,5.6) B12(2.4,5.6) B13(3.2,5.6) B14(4,5.6) B15(4.8,5.6) B16(5.6,5.6) B17(6.4,5.6) C1(-6.4,4.8) C2(-5.6,4.8) C3(-4.8,4.8) C4(-4,4.8) C5(-3.2,4.8) C6(-2.4,4.8) C7(-1.6,4.8) C8(-0.8,4.8) C9(0,4.8) C10(0.8,4.8) C11(1.6,4.8) C12(2.4,4.8) C13(3.2,4.8) C14(4,4.8) C15(4.8,4.8) C16(5.6,4.8) C17(6.4,4.8) D1(-6.4,4) D2(-5.6,4) D3(-4.8,4) D4(-4,4) D5(-3.2,4) D6(-2.4,4) D7(-1.6,4) D8(-0.8,4) D9(0,4) D10(0.8,4) D11(1.6,4) D12(2.4,4) D13(3.2,4) D14(4,4) D15(4.8,4) D16(5.6,4) D17(6.4,4) E1(-6.4,3.2) E2(-5.6,3.2) E3(-4.8,3.2) E4(-4,3.2) E5(-3.2,3.2) E6(-2.4,3.2) E7(-1.6,3.2) E8(-0.8,3.2) E9(0,3.2) E10(0.8,3.2) E11(1.6,3.2) E12(2.4,3.2) E13(3.2,3.2) E14(4,3.2) E15(4.8,3.2) E16(5.6,3.2) E17(6.4,3.2) F1(-6.4,2.4) F2(-5.6,2.4) F3(-4.8,2.4) F4(-4,2.4) F5(-3.2,2.4) F13(3.2,2.4) F14(4,2.4) F15(4.8,2.4) F16(5.6,2.4) F17(6.4,2.4) G1(-6.4,1.6) G2(-5.6,1.6) G3(-4.8,1.6) G4(-4,1.6) G5(-3.2,1.6) G7(-1.6,1.6) G8(-0.8,1.6) G9(0,1.6) G10(0.8,1.6) G11(1.6,1.6) G13(3.2,1.6) G14(4,1.6) G15(4.8,1.6) G16(5.6,1.6) G17(6.4,1.6) H1(-6.4,0.8) H2(-5.6,0.8) H3(-4.8,0.8) H4(-4,0.8) H5(-3.2,0.8) H7(-1.6,0.8) H8(-0.8,0.8) H9(0,0.8) H10(0.8,0.8) H11(1.6,0.8) H13(3.2,0.8) H14(4,0.8) H15(4.8,0.8) H16(5.6,0.8) H17(6.4,0.8) J1(-6.4,0) J2(-5.6,0) J3(-4.8,0) J4(-4,0) J5(-3.2,0) J7(-1.6,0) J8(-0.8,0) J9(0,0) J10(0.8,0) J11(1.6,0) J13(3.2,0) J14(4,0) J15(4.8,0) J16(5.6,0) J17(6.4,0) K1(-6.4,-0.8) K2(-5.6,-0.8) K3(-4.8,-0.8) K4(-4,-0.8) K5(-3.2,-0.8) K7(-1.6,-0.8) K8(-0.8,-0.8) K9(0,-0.8) K10(0.8,-0.8) K11(1.6,-0.8) K13(3.2,-0.8) K14(4,-0.8) K15(4.8,-0.8) K16(5.6,-0.8) K17(6.4,-0.8) L1(-6.4,-1.6) L2(-5.6,-1.6) L3(-4.8,-1.6) L4(-4,-1.6) L5(-3.2,-1.6) L7(-1.6,-1.6) L8(-0.8,-1.6) L9(0,-1.6) L10(0.8,-1.6) L11(1.6,-1.6) L13(3.2,-1.6) L14(4,-1.6) L15(4.8,-1.6) L16(5.6,-1.6) L17(6.4,-1.6) M1(-6.4,-2.4) M2(-5.6,-2.4) M3(-4.8,-2.4) M4(-4,-2.4) M5(-3.2,-2.4) M13(3.2,-2.4) M14(4,-2.4) M15(4.8,-2.4) M16(5.6,-2.4) M17(6.4,-2.4) N1(-6.4,-3.2) N2(-5.6,-3.2) N3(-4.8,-3.2) N4(-4,-3.2) N5(-3.2,-3.2) N6(-2.4,-3.2) N7(-1.6,-3.2) N8(-0.8,-3.2) N9(0,-3.2) N10(0.8,-3.2) N11(1.6,-3.2) N12(2.4,-3.2) N13(3.2,-3.2) N14(4,-3.2) N15(4.8,-3.2) N16(5.6,-3.2) N17(6.4,-3.2) P1(-6.4,-4) P2(-5.6,-4) P3(-4.8,-4) P4(-4,-4) P5(-3.2,-4) P6(-2.4,-4) P7(-1.6,-4) P8(-0.8,-4) P9(0,-4) P10(0.8,-4) P11(1.6,-4) P12(2.4,-4) P13(3.2,-4) P14(4,-4) P15(4.8,-4) P16(5.6,-4) P17(6.4,-4) R1(-6.4,-4.8) R2(-5.6,-4.8) R3(-4.8,-4.8) R4(-4,-4.8) R5(-3.2,-4.8) R6(-2.4,-4.8) R7(-1.6,-4.8) R8(-0.8,-4.8) R9(0,-4.8) R10(0.8,-4.8) R11(1.6,-4.8) R12(2.4,-4.8) R13(3.2,-4.8) R14(4,-4.8) R15(4.8,-4.8) R16(5.6,-4.8) R17(6.4,-4.8) T1(-6.4,-5.6) T2(-5.6,-5.6) T3(-4.8,-5.6) T4(-4,-5.6) T5(-3.2,-5.6) T6(-2.4,-5.6) T7(-1.6,-5.6) T8(-0.8,-5.6) T9(0,-5.6) T10(0.8,-5.6) T11(1.6,-5.6) T12(2.4,-5.6) T13(3.2,-5.6) T14(4,-5.6) T15(4.8,-5.6) T16(5.6,-5.6) T17(6.4,-5.6) U1(-6.4,-6.4) U2(-5.6,-6.4) U3(-4.8,-6.4) U4(-4,-6.4) U5(-3.2,-6.4) U6(-2.4,-6.4) U7(-1.6,-6.4) U8(-0.8,-6.4) U9(0,-6.4) U10(0.8,-6.4) U11(1.6,-6.4) U12(2.4,-6.4) U13(3.2,-6.4) U14(4,-6.4) U15(4.8,-6.4) U16(5.6,-6.4) U17(6.4,-6.4)
  silkscreen extent -8.12,-7.07 7.07,7.07, body extent -7.57,-7.57 7.57,7.57, height 0.25
HRS_DF17(4.0)-60DP-0.5V(57) [mm]
  rect 0.25x1.15 smd paste+0 mask+0.102: 1(-7.25,-2.575) 2(-7.25,2.575) 3(-6.75,-2.575) 4(-6.75,2.575) 5(-6.25,-2.575) 6(-6.25,2.575) 7(-5.75,-2.575) 8(-5.75,2.575) 9(-5.25,-2.575) 10(-5.25,2.575) 11(-4.75,-2.575) 12(-4.75,2.575) 13(-4.25,-2.575) 14(-4.25,2.575) 15(-3.75,-2.575) 16(-3.75,2.575) 17(-3.25,-2.575) 18(-3.25,2.575) 19(-2.75,-2.575) 20(-2.75,2.575) 21(-2.25,-2.575) 22(-2.25,2.575) 23(-1.75,-2.575) 24(-1.75,2.575) 25(-1.25,-2.575) 26(-1.25,2.575) 27(-0.75,-2.575) 28(-0.75,2.575) 29(-0.25,-2.575) 30(-0.25,2.575) 31(0.25,-2.575) 32(0.25,2.575) 33(0.75,-2.575) 34(0.75,2.575) 35(1.25,-2.575) 36(1.25,2.575) 37(1.75,-2.575) 38(1.75,2.575) 39(2.25,-2.575) 40(2.25,2.575) 41(2.75,-2.575) 42(2.75,2.575) 43(3.25,-2.575) 44(3.25,2.575) 45(3.75,-2.575) 46(3.75,2.575) 47(4.25,-2.575) 48(4.25,2.575) 49(4.75,-2.575) 50(4.75,2.575) 51(5.25,-2.575) 52(5.25,2.575) 53(5.75,-2.575) 54(5.75,2.575) 55(6.25,-2.575) 56(6.25,2.575) 57(6.75,-2.575) 58(6.75,2.575) 59(7.25,-2.575) 60(7.25,2.575)
  rect 1.4x2.1 smd paste+0 mask+0.102: S1(-9.5,0) S2(9.5,0)
  round 0.65 hole 0.65 unplated mask+0: ""(-8.5,-1.9) ""(8.5,-1.9)
  silkscreen extent -10,-4.25 10,2.35, body extent -10,-2.79 10,2.91, height 6.29
HRS_DF17(4.0)-80DP-0.5V(57) [mm]
  rect 0.25x1.15 smd paste+0 mask+0.102: 1(-9.75,-2.575) 2(-9.75,2.575) 3(-9.25,-2.575) 4(-9.25,2.575) 5(-8.75,-2.575) 6(-8.75,2.575) 7(-8.25,-2.575) 8(-8.25,2.575) 9(-7.75,-2.575) 10(-7.75,2.575) 11(-7.25,-2.575) 12(-7.25,2.575) 13(-6.75,-2.575) 14(-6.75,2.575) 15(-6.25,-2.575) 16(-6.25,2.575) 17(-5.75,-2.575) 18(-5.75,2.575) 19(-5.25,-2.575) 20(-5.25,2.575) 21(-4.75,-2.575) 22(-4.75,2.575) 23(-4.25,-2.575) 24(-4.25,2.575) 25(-3.75,-2.575) 26(-3.75,2.575) 27(-3.25,-2.575) 28(-3.25,2.575) 29(-2.75,-2.575) 30(-2.75,2.575) 31(-2.25,-2.575) 32(-2.25,2.575) 33(-1.75,-2.575) 34(-1.75,2.575) 35(-1.25,-2.575) 36(-1.25,2.575) 37(-0.75,-2.575) 38(-0.75,2.575) 39(-0.25,-2.575) 40(-0.25,2.575) 41(0.25,-2.575) 42(0.25,2.575) 43(0.75,-2.575) 44(0.75,2.575) 45(1.25,-2.575) 46(1.25,2.575) 47(1.75,-2.575) 48(1.75,2.575) 49(2.25,-2.575) 50(2.25,2.575) 51(2.75,-2.575) 52(2.75,2.575) 53(3.25,-2.575) 54(3.25,2.575) 55(3.75,-2.575) 56(3.75,2.575) 57(4.25,-2.575) 58(4.25,2.575) 59(4.75,-2.575) 60(4.75,2.575) 61(5.25,-2.575) 62(5.25,2.575) 63(5.75,-2.575) 64(5.75,2.575) 65(6.25,-2.575) 66(6.25,2.575) 67(6.75,-2.575) 68(6.75,2.575) 69(7.25,-2.575) 70(7.25,2.575) 71(7.75,-2.575) 72(7.75,2.575) 73(8.25,-2.575) 74(8.25,2.575) 75(8.75,-2.575) 76(8.75,2.575) 77(9.25,-2.575) 78(9.25,2.575) 79(9.75,-2.575) 80(9.75,2.575)
  rect 1.4x2.1 smd paste+0 mask+0.102: S1(-12,0) S2(12,0)
  round 0.65 hole 0.65 unplated mask+0: ""(-11,-1.9) ""(11,-1.9)
  silkscreen extent -12.5,-4.25 12.5,2.35, body extent -12.5,-2.79 12.5,2.91, height 6.29
IC_TPS259474ARPWR [mm]
  rrect37% 0.6x0.3 smd paste-1 mask+0: 1(-0.9,0.7) 4(-0.9,-0.7) 7(0.9,-0.7) 10(0.9,0.7)
  rrect37% 0.6x0.25 smd mask+0: 2(-0.9,0.225) 3(-0.9,-0.225) 8(0.9,-0.225) 9(0.9,0.225)
  rrect37% 0.3x2.4 smd paste-2 mask+0: 5(-0.25,0) 6(0.25,0)
  L1 region: 1.158,-0.551 1.16,-0.551 1.163,-0.552 1.165,-0.552 1.168,-0.553 1.17,-0.554 1.173,-0.555 1.175,-0.557 1.177,-0.558 1.179,-0.56 1.181,-0.561 1.183,-0.563 1.185,-0.565 1.187,-0.567 1.189,-0.569 1.19,-0.571 1.192,-0.573 1.193,-0.575 1.195,-0.577 1.196,-0.58 1.197,-0.582 1.198,-0.585 1.198,-0.587 1.199,-0.59 1.199,-0.592 1.2,-0.595 1.2,-0.597 1.2,-0.6 1.2,-0.8 1.2,-0.803 1.2,-0.805 1.199,-0.808 1.199,-0.81 1.198,-0.813 1.198,-0.815 1.197,-0.818 1.196,-0.82 1.195,-0.823 1.193,-0.825 1.192,-0.827 1.19,-0.829 1.189,-0.831 1.187,-0.833 1.185,-0.835 1.183,-0.837 1.181,-0.839 1.179,-0.84 1.177,-0.842 1.175,-0.843 1.173,-0.845 1.17,-0.846 1.168,-0.847 1.165,-0.848 1.163,-0.848 1.16,-0.849 1.158,-0.849 1.155,-0.85 0.85,-0.85 0.85,-1.15 0.85,-1.153 0.85,-1.155 0.849,-1.158 0.849,-1.16 0.848,-1.163 0.848,-1.165 0.847,-1.168 0.846,-1.17 0.845,-1.173 0.843,-1.175 0.842,-1.177 0.84,-1.179 0.839,-1.181 0.837,-1.183 0.835,-1.185 0.833,-1.187 0.831,-1.189 0.829,-1.19 0.827,-1.192 0.825,-1.193 0.823,-1.195 0.82,-1.196 0.818,-1.197 0.815,-1.198 0.813,-1.198 0.81,-1.199 0.808,-1.199 0.805,-1.2 0.645,-1.2 0.642,-1.199 0.64,-1.199 0.637,-1.198 0.635,-1.198 0.632,-1.197 0.63,-1.196 0.627,-1.195 0.625,-1.193 0.623,-1.192 0.621,-1.19 0.619,-1.189 0.617,-1.187 0.615,-1.185 0.613,-1.183 0.611,-1.181 0.61,-1.179 0.608,-1.177 0.607,-1.175 0.605,-1.173 0.604,-1.17 0.603,-1.168 0.602,-1.165 0.602,-1.163 0.601,-1.16 0.601,-1.158 0.6,-1.155 0.6,-1.153 0.6,-1.15 0.6,-0.6 0.6,-0.597 0.6,-0.595 0.601,-0.592 0.601,-0.59 0.602,-0.587 0.602,-0.585 0.603,-0.582 0.604,-0.58 0.605,-0.577 0.607,-0.575 0.608,-0.573 0.61,-0.571 0.611,-0.569 0.613,-0.567 0.615,-0.565 0.617,-0.563 0.619,-0.561 0.621,-0.56 0.623,-0.558 0.625,-0.557 0.627,-0.555 0.63,-0.554 0.632,-0.553 0.635,-0.552 0.637,-0.552 0.64,-0.551 0.642,-0.551 0.645,-0.55 1.155,-0.55
  L1 region: 0.808,1.199 0.81,1.199 0.813,1.198 0.815,1.198 0.818,1.197 0.82,1.196 0.823,1.195 0.825,1.193 0.827,1.192 0.829,1.19 0.831,1.189 0.833,1.187 0.835,1.185 0.837,1.183 0.839,1.181 0.84,1.179 0.842,1.177 0.843,1.175 0.845,1.173 0.846,1.17 0.847,1.168 0.848,1.165 0.848,1.163 0.849,1.16 0.849,1.158 0.85,1.155 0.85,1.153 0.85,1.15 0.85,0.85 1.155,0.85 1.158,0.849 1.16,0.849 1.163,0.848 1.165,0.848 1.168,0.847 1.17,0.846 1.173,0.845 1.175,0.843 1.177,0.842 1.179,0.84 1.181,0.839 1.183,0.837 1.185,0.835 1.187,0.833 1.189,0.831 1.19,0.829 1.192,0.827 1.193,0.825 1.195,0.823 1.196,0.82 1.197,0.818 1.198,0.815 1.198,0.813 1.199,0.81 1.199,0.808 1.2,0.805 1.2,0.803 1.2,0.8 1.2,0.6 1.2,0.597 1.2,0.595 1.199,0.592 1.199,0.59 1.198,0.587 1.198,0.585 1.197,0.582 1.196,0.58 1.195,0.577 1.193,0.575 1.192,0.573 1.19,0.571 1.189,0.569 1.187,0.567 1.185,0.565 1.183,0.563 1.181,0.561 1.179,0.56 1.177,0.558 1.175,0.557 1.173,0.555 1.17,0.554 1.168,0.553 1.165,0.552 1.163,0.552 1.16,0.551 1.158,0.551 1.155,0.55 0.645,0.55 0.642,0.551 0.64,0.551 0.637,0.552 0.635,0.552 0.632,0.553 0.63,0.554 0.627,0.555 0.625,0.557 0.623,0.558 0.621,0.56 0.619,0.561 0.617,0.563 0.615,0.565 0.613,0.567 0.611,0.569 0.61,0.571 0.608,0.573 0.607,0.575 0.605,0.577 0.604,0.58 0.603,0.582 0.602,0.585 0.602,0.587 0.601,0.59 0.601,0.592 0.6,0.595 0.6,0.597 0.6,0.6 0.6,1.15 0.6,1.153 0.6,1.155 0.601,1.158 0.601,1.16 0.602,1.163 0.602,1.165 0.603,1.168 0.604,1.17 0.605,1.173 0.607,1.175 0.608,1.177 0.61,1.179 0.611,1.181 0.613,1.183 0.615,1.185 0.617,1.187 0.619,1.189 0.621,1.19 0.623,1.192 0.625,1.193 0.627,1.195 0.63,1.196 0.632,1.197 0.635,1.198 0.637,1.198 0.64,1.199 0.642,1.199 0.645,1.2 0.805,1.2
  L1 region: -0.642,1.199 -0.64,1.199 -0.637,1.198 -0.635,1.198 -0.632,1.197 -0.63,1.196 -0.627,1.195 -0.625,1.193 -0.623,1.192 -0.621,1.19 -0.619,1.189 -0.617,1.187 -0.615,1.185 -0.613,1.183 -0.611,1.181 -0.61,1.179 -0.608,1.177 -0.607,1.175 -0.605,1.173 -0.604,1.17 -0.603,1.168 -0.602,1.165 -0.602,1.163 -0.601,1.16 -0.601,1.158 -0.6,1.155 -0.6,1.153 -0.6,1.15 -0.6,0.6 -0.6,0.597 -0.6,0.595 -0.601,0.592 -0.601,0.59 -0.602,0.587 -0.602,0.585 -0.603,0.582 -0.604,0.58 -0.605,0.577 -0.607,0.575 -0.608,0.573 -0.61,0.571 -0.611,0.569 -0.613,0.567 -0.615,0.565 -0.617,0.563 -0.619,0.561 -0.621,0.56 -0.623,0.558 -0.625,0.557 -0.627,0.555 -0.63,0.554 -0.632,0.553 -0.635,0.552 -0.637,0.552 -0.64,0.551 -0.642,0.551 -0.645,0.55 -1.155,0.55 -1.158,0.551 -1.16,0.551 -1.163,0.552 -1.165,0.552 -1.168,0.553 -1.17,0.554 -1.173,0.555 -1.175,0.557 -1.177,0.558 -1.179,0.56 -1.181,0.561 -1.183,0.563 -1.185,0.565 -1.187,0.567 -1.189,0.569 -1.19,0.571 -1.192,0.573 -1.193,0.575 -1.195,0.577 -1.196,0.58 -1.197,0.582 -1.198,0.585 -1.198,0.587 -1.199,0.59 -1.199,0.592 -1.2,0.595 -1.2,0.597 -1.2,0.6 -1.2,0.8 -1.2,0.803 -1.2,0.805 -1.199,0.808 -1.199,0.81 -1.198,0.813 -1.198,0.815 -1.197,0.818 -1.196,0.82 -1.195,0.823 -1.193,0.825 -1.192,0.827 -1.19,0.829 -1.189,0.831 -1.187,0.833 -1.185,0.835 -1.183,0.837 -1.181,0.839 -1.179,0.84 -1.177,0.842 -1.175,0.843 -1.173,0.845 -1.17,0.846 -1.168,0.847 -1.165,0.848 -1.163,0.848 -1.16,0.849 -1.158,0.849 -1.155,0.85 -0.85,0.85 -0.85,1.15 -0.85,1.153 -0.85,1.155 -0.849,1.158 -0.849,1.16 -0.848,1.163 -0.848,1.165 -0.847,1.168 -0.846,1.17 -0.845,1.173 -0.843,1.175 -0.842,1.177 -0.84,1.179 -0.839,1.181 -0.837,1.183 -0.835,1.185 -0.833,1.187 -0.831,1.189 -0.829,1.19 -0.827,1.192 -0.825,1.193 -0.823,1.195 -0.82,1.196 -0.818,1.197 -0.815,1.198 -0.813,1.198 -0.81,1.199 -0.808,1.199 -0.805,1.2 -0.645,1.2
  L1 region: -0.642,-0.551 -0.64,-0.551 -0.637,-0.552 -0.635,-0.552 -0.632,-0.553 -0.63,-0.554 -0.627,-0.555 -0.625,-0.557 -0.623,-0.558 -0.621,-0.56 -0.619,-0.561 -0.617,-0.563 -0.615,-0.565 -0.613,-0.567 -0.611,-0.569 -0.61,-0.571 -0.608,-0.573 -0.607,-0.575 -0.605,-0.577 -0.604,-0.58 -0.603,-0.582 -0.602,-0.585 -0.602,-0.587 -0.601,-0.59 -0.601,-0.592 -0.6,-0.595 -0.6,-0.597 -0.6,-0.6 -0.6,-1.15 -0.6,-1.153 -0.6,-1.155 -0.601,-1.158 -0.601,-1.16 -0.602,-1.163 -0.602,-1.165 -0.603,-1.168 -0.604,-1.17 -0.605,-1.173 -0.607,-1.175 -0.608,-1.177 -0.61,-1.179 -0.611,-1.181 -0.613,-1.183 -0.615,-1.185 -0.617,-1.187 -0.619,-1.189 -0.621,-1.19 -0.623,-1.192 -0.625,-1.193 -0.627,-1.195 -0.63,-1.196 -0.632,-1.197 -0.635,-1.198 -0.637,-1.198 -0.64,-1.199 -0.642,-1.199 -0.645,-1.2 -0.805,-1.2 -0.808,-1.199 -0.81,-1.199 -0.813,-1.198 -0.815,-1.198 -0.818,-1.197 -0.82,-1.196 -0.823,-1.195 -0.825,-1.193 -0.827,-1.192 -0.829,-1.19 -0.831,-1.189 -0.833,-1.187 -0.835,-1.185 -0.837,-1.183 -0.839,-1.181 -0.84,-1.179 -0.842,-1.177 -0.843,-1.175 -0.845,-1.173 -0.846,-1.17 -0.847,-1.168 -0.848,-1.165 -0.848,-1.163 -0.849,-1.16 -0.849,-1.158 -0.85,-1.155 -0.85,-1.153 -0.85,-1.15 -0.85,-0.85 -1.155,-0.85 -1.158,-0.849 -1.16,-0.849 -1.163,-0.848 -1.165,-0.848 -1.168,-0.847 -1.17,-0.846 -1.173,-0.845 -1.175,-0.843 -1.177,-0.842 -1.179,-0.84 -1.181,-0.839 -1.183,-0.837 -1.185,-0.835 -1.187,-0.833 -1.189,-0.831 -1.19,-0.829 -1.192,-0.827 -1.193,-0.825 -1.195,-0.823 -1.196,-0.82 -1.197,-0.818 -1.198,-0.815 -1.198,-0.813 -1.199,-0.81 -1.199,-0.808 -1.2,-0.805 -1.2,-0.803 -1.2,-0.8 -1.2,-0.6 -1.2,-0.597 -1.2,-0.595 -1.199,-0.592 -1.199,-0.59 -1.198,-0.587 -1.198,-0.585 -1.197,-0.582 -1.196,-0.58 -1.195,-0.577 -1.193,-0.575 -1.192,-0.573 -1.19,-0.571 -1.189,-0.569 -1.187,-0.567 -1.185,-0.565 -1.183,-0.563 -1.181,-0.561 -1.179,-0.56 -1.177,-0.558 -1.175,-0.557 -1.173,-0.555 -1.17,-0.554 -1.168,-0.553 -1.165,-0.552 -1.163,-0.552 -1.16,-0.551 -1.158,-0.551 -1.155,-0.55 -0.645,-0.55
  silkscreen extent -1.4,1.2 -1.2,1.4, body extent -1,-1 1,1, height 1
"IPC C C0402 NO SILK" [mm] "Chip Capacitor, 2-Leads, Body 1.02x0.51mm, IPC High Density"
  rect 0.46x0.54 smd: 1(-0.46,0) 2(0.46,0)
  body extent -0.51,-0.26 0.51,0.25, height 0.51
"IPC C R0402 NO SILK" [mm] "Chip Resistor, 2-Leads, Body 1.02x0.51mm, IPC High Density"
  rect 0.4x0.5 smd: 1(-0.475,0) 2(0.475,0)
  body extent -0.51,-0.26 0.51,0.26, height 0.26
LED_0603_YELLOW [mm]
  rrect25% 0.5x0.8 smd: 1(-0.6,0) 2(0.6,0)
  silkscreen extent -1.1,-0.46 0.09,0.46, body extent -0.8,-0.4 0.8,0.4, height 0.6
LGA-14L_L3.0-W2.5-P0.50-TL [mil]
  rrect25% 19.7x11 smd: 1(-46.3,29.5) 2(-46.3,9.9) 3(-46.3,-9.8) 4(-46.3,-29.5) 8(46.2,-29.5) 9(46.2,-9.8) 10(46.2,9.9) 11(46.2,29.5)
  rrect25% 11x19.7 smd: 5(-19.7,-36.4) 6(0,-36.4) 7(19.6,-36.4) 12(19.6,36.4) 13(0,36.4) 14(-19.7,36.4)
  silkscreen extent -62,-52 62,52, body extent -59,-49 59,49, height 36
MH_M3_NPTH_7mmKO-Footprint-1 [mm]
  round 3.2 / inner round 1.6 / far side round 3.2 hole 3.2 unplated paste-2 mask+1.3: 1(0,0)
  Keep-Out Layer circle w0.2: c0,0 r3.1
OSC-SMD_4P-L3.2-W2.5-BL [mm]
  rect 1.4x1.2 smd mask+0.051: 1(-1.1,-0.875) 2(1.1,-0.875) 3(1.1,0.875) 4(-1.1,0.875)
  silkscreen extent -2.11,-1.21 -2.09,-1.19, body extent -1.65,-1.32 1.65,1.32, height 0.81
PCBComponent_1 [mm]
  round 0.8 smd: 1(0,0)
PQFN50P300X250X97-14N [mm]
  rrect50% 0.59x0.35 smd mask+0: 1(-1.165,0.75) 2(-1.165,0.25) 3(-1.165,-0.25) 4(-1.165,-0.75) 8(1.165,-0.75) 9(1.165,-0.25) 10(1.165,0.25) 11(1.165,0.75)
  rrect50% 0.35x0.59 smd mask+0: 5(-0.5,-0.915) 6(0,-0.915) 7(0.5,-0.915) 12(0.5,0.915) 13(0,0.915) 14(-0.5,0.915)
  silkscreen extent -2.1,-1.25 1.5,1.25
SOIC127P600X175-8N [mm]
  rect 1.6x0.6 smd: 1(-2.7,1.905)
  rect 1.55x0.6 smd: 2(-2.7,0.635) 3(-2.7,-0.635) 4(-2.7,-1.905) 5(2.7,-1.905) 6(2.7,-0.635) 7(2.7,0.635) 8(2.7,1.905)
  silkscreen extent -3.81,-2.29 1.52,2.29, body extent -3,-2.45 3,2.45, height 1.75
SOIC127P602X173-8N-1-V [mm] "SOIC,1.27mm pitch;8 pin,3.899mm W X 4.889mm L X 1.727mm H body"
  rect 1.47x0.65 smd paste+0 mask+0: 1(-2.77,1.905) 2(-2.77,0.635) 3(-2.77,-0.635) 4(-2.77,-1.905) 5(2.77,-1.905) 6(2.77,-0.635) 7(2.77,0.635) 8(2.77,1.905)
  silkscreen extent -3.8,-2.25 1.5,2.25, body extent -3.01,-2.44 3.01,2.44, height 1.74
SON8_MS5611_TEC [mm]
  rect 1.092x0.61 smd paste-0.305 mask+0: 1(-1.1,1.875) 2(-1.1,0.625) 3(-1.1,-0.625) 4(-1.1,-1.875) 5(1.1,-1.875) 6(1.1,-0.625) 7(1.1,0.625) 8(1.1,1.875)
  silkscreen extent -2.45,-2.88 1.88,2.88, body extent -1.5,-2.5 1.5,2.5, height 0.97
SOT50P160X60-6N [mm]
  rrect8% 0.75x0.35 smd: 1(-0.69,0.5) 2(-0.69,0) 3(-0.69,-0.5) 4(0.69,-0.5) 5(0.69,0) 6(0.69,0.5)
  silkscreen extent -0.65,-0.85 0.65,0.85
SOTFL50P160X60-8N [mm]
  rrect25% 0.66x0.32 smd: 1(-0.735,0.75) 2(-0.735,0.25) 3(-0.735,-0.25) 4(-0.735,-0.75) 5(0.735,-0.75) 6(0.735,-0.25) 7(0.735,0.25) 8(0.735,0.75)
  silkscreen extent -1.7,-1.23 0.6,1.23, body extent -0.8,-1.05 0.8,1.05, height 0.6
USB4105-GF-A-060 [mm]
  rrect25% 0.6x1.15 smd mask+0.05: A1B12(-3.2,2.378) A4B9(-2.4,2.378) B1A12(3.2,2.378) B4A9(2.4,2.378)
  rrect25% 0.3x1.15 smd mask+0.05: A5(-1.25,2.378) A6(-0.25,2.378) A7(0.25,2.378) A8(1.25,2.378) B5(1.75,2.378) B6(0.75,2.378) B7(-0.75,2.378) B8(-1.75,2.378)
  round 0.65 hole 0.65 unplated mask+0.05: MH(-2.89,1.303) MH(2.89,1.303)
  oval 1x1.8 hole 0.6 slot 1.4 at 90 deg: SH(-4.32,-2.377) SH(4.32,-2.377)
  oval 1x2.1 hole 0.6 slot 1.7 at 90 deg: SH(-4.32,1.803) SH(4.32,1.803)
  silkscreen extent -4.25,-4.5 4.25,0.25, body extent -4.47,-4.97 4.47,2.73, height 3.27
XCVR_TCAN3414DRBR [mm]
  rrect33% 0.6x0.3 smd paste-1 mask+0: 1(-1.4,0.975) 2(-1.4,0.325) 3(-1.4,-0.325) 4(-1.4,-0.975) 5(1.4,-0.975) 6(1.4,-0.325) 7(1.4,0.325) 8(1.4,0.975)
  rrect6% 1.65x2.4 smd paste-2 mask+0: 9(0,0)
  silkscreen extent -2.5,-1.5 1.5,1.57, body extent -1.5,-1.5 1.5,1.5, height 1